# Altium PCB PCB_Palm_v2.2.PcbDoc (part 1 of 3)
Units mil, origin at the board's own origin, x right, y up, seen from the top; angles counter-clockwise.
Board outline 1773 x 1966 mil, 4 copper layers (Top Layer, Signal_1, Signal_2, Bottom Layer), stack 62.008 mil thick; 124 components, 104 nets, 490 pads, 277 vias.
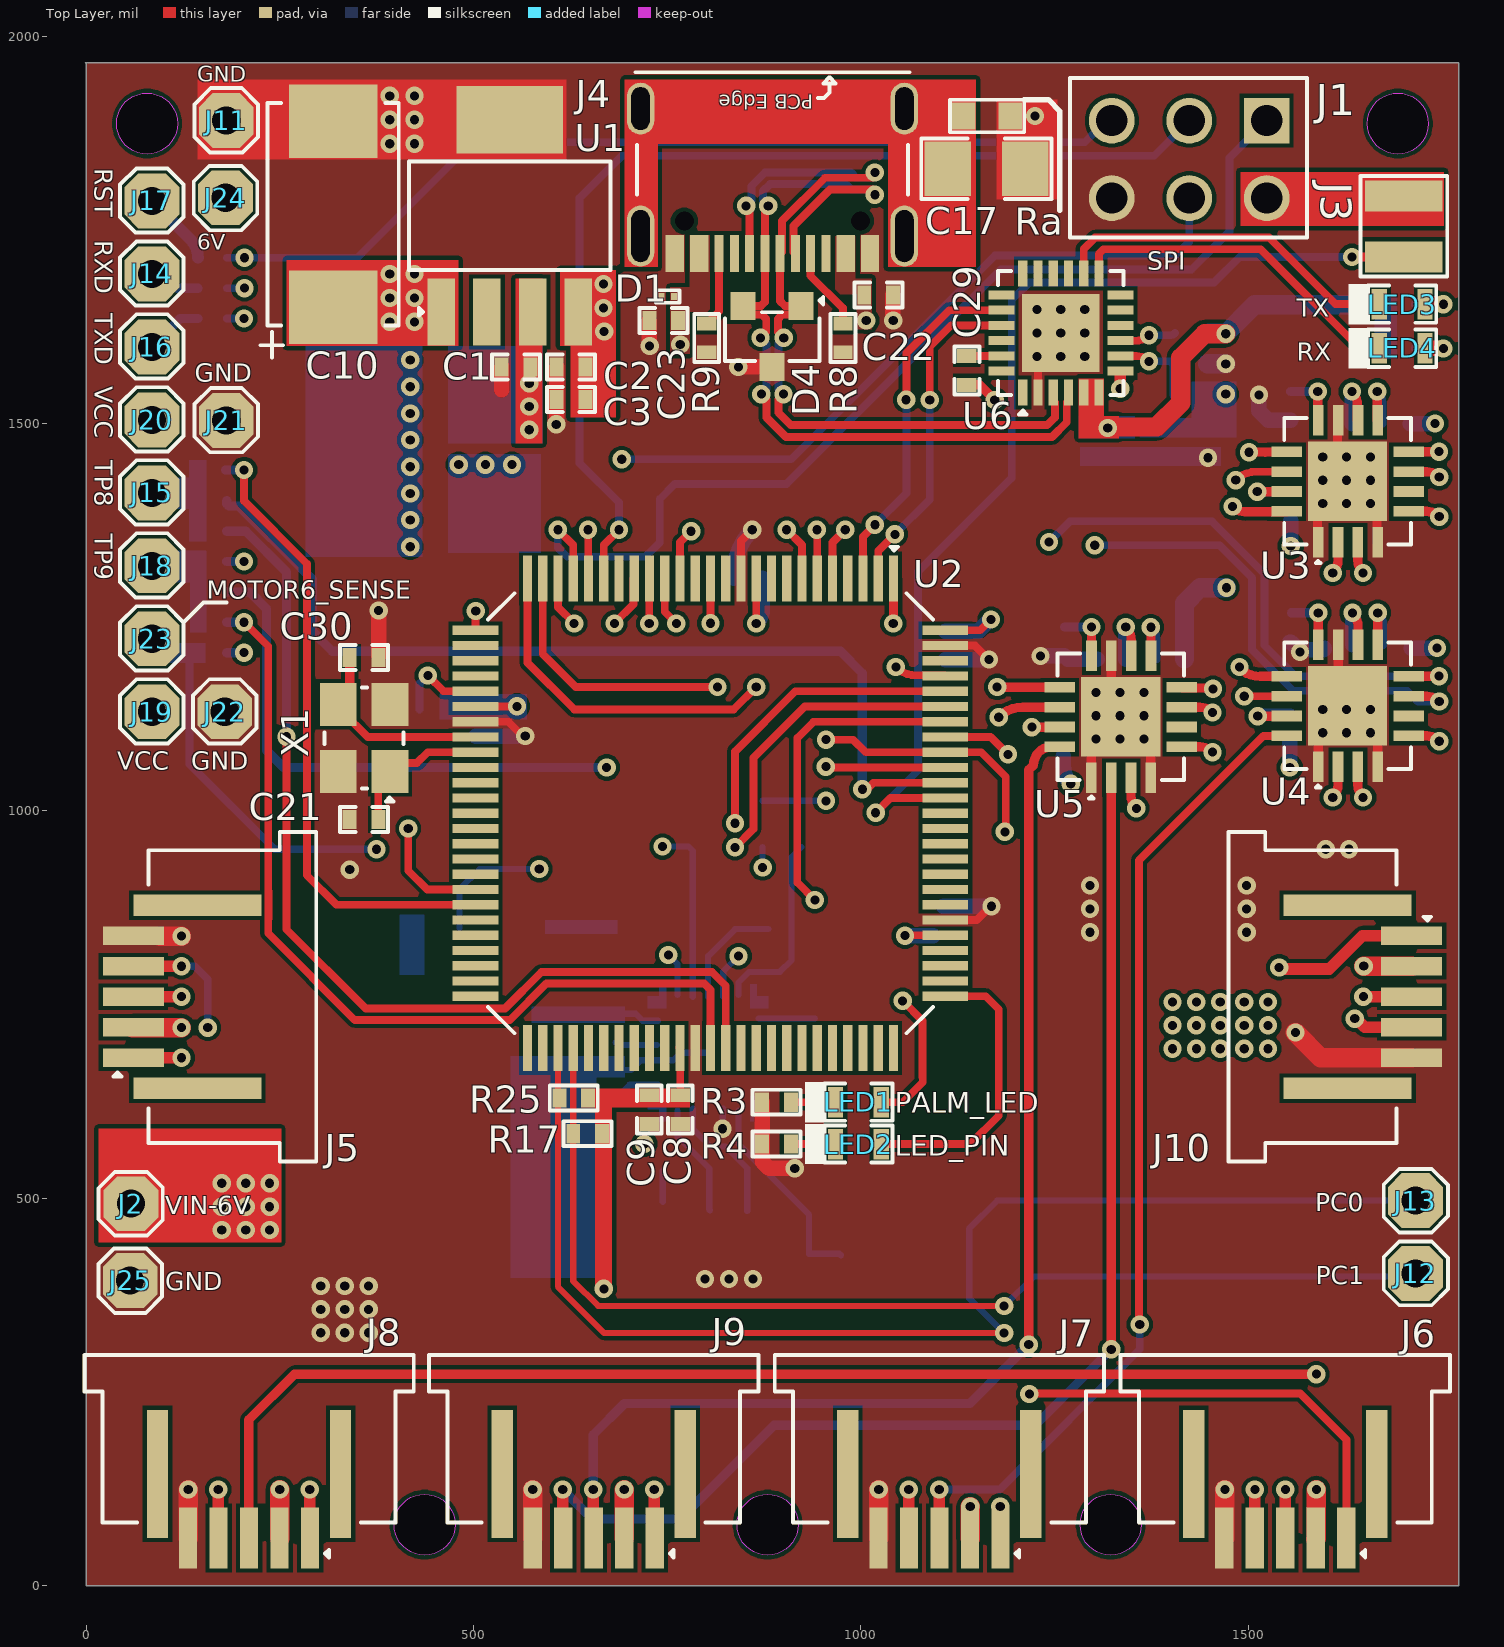
[diagram p0: Top Layer view]
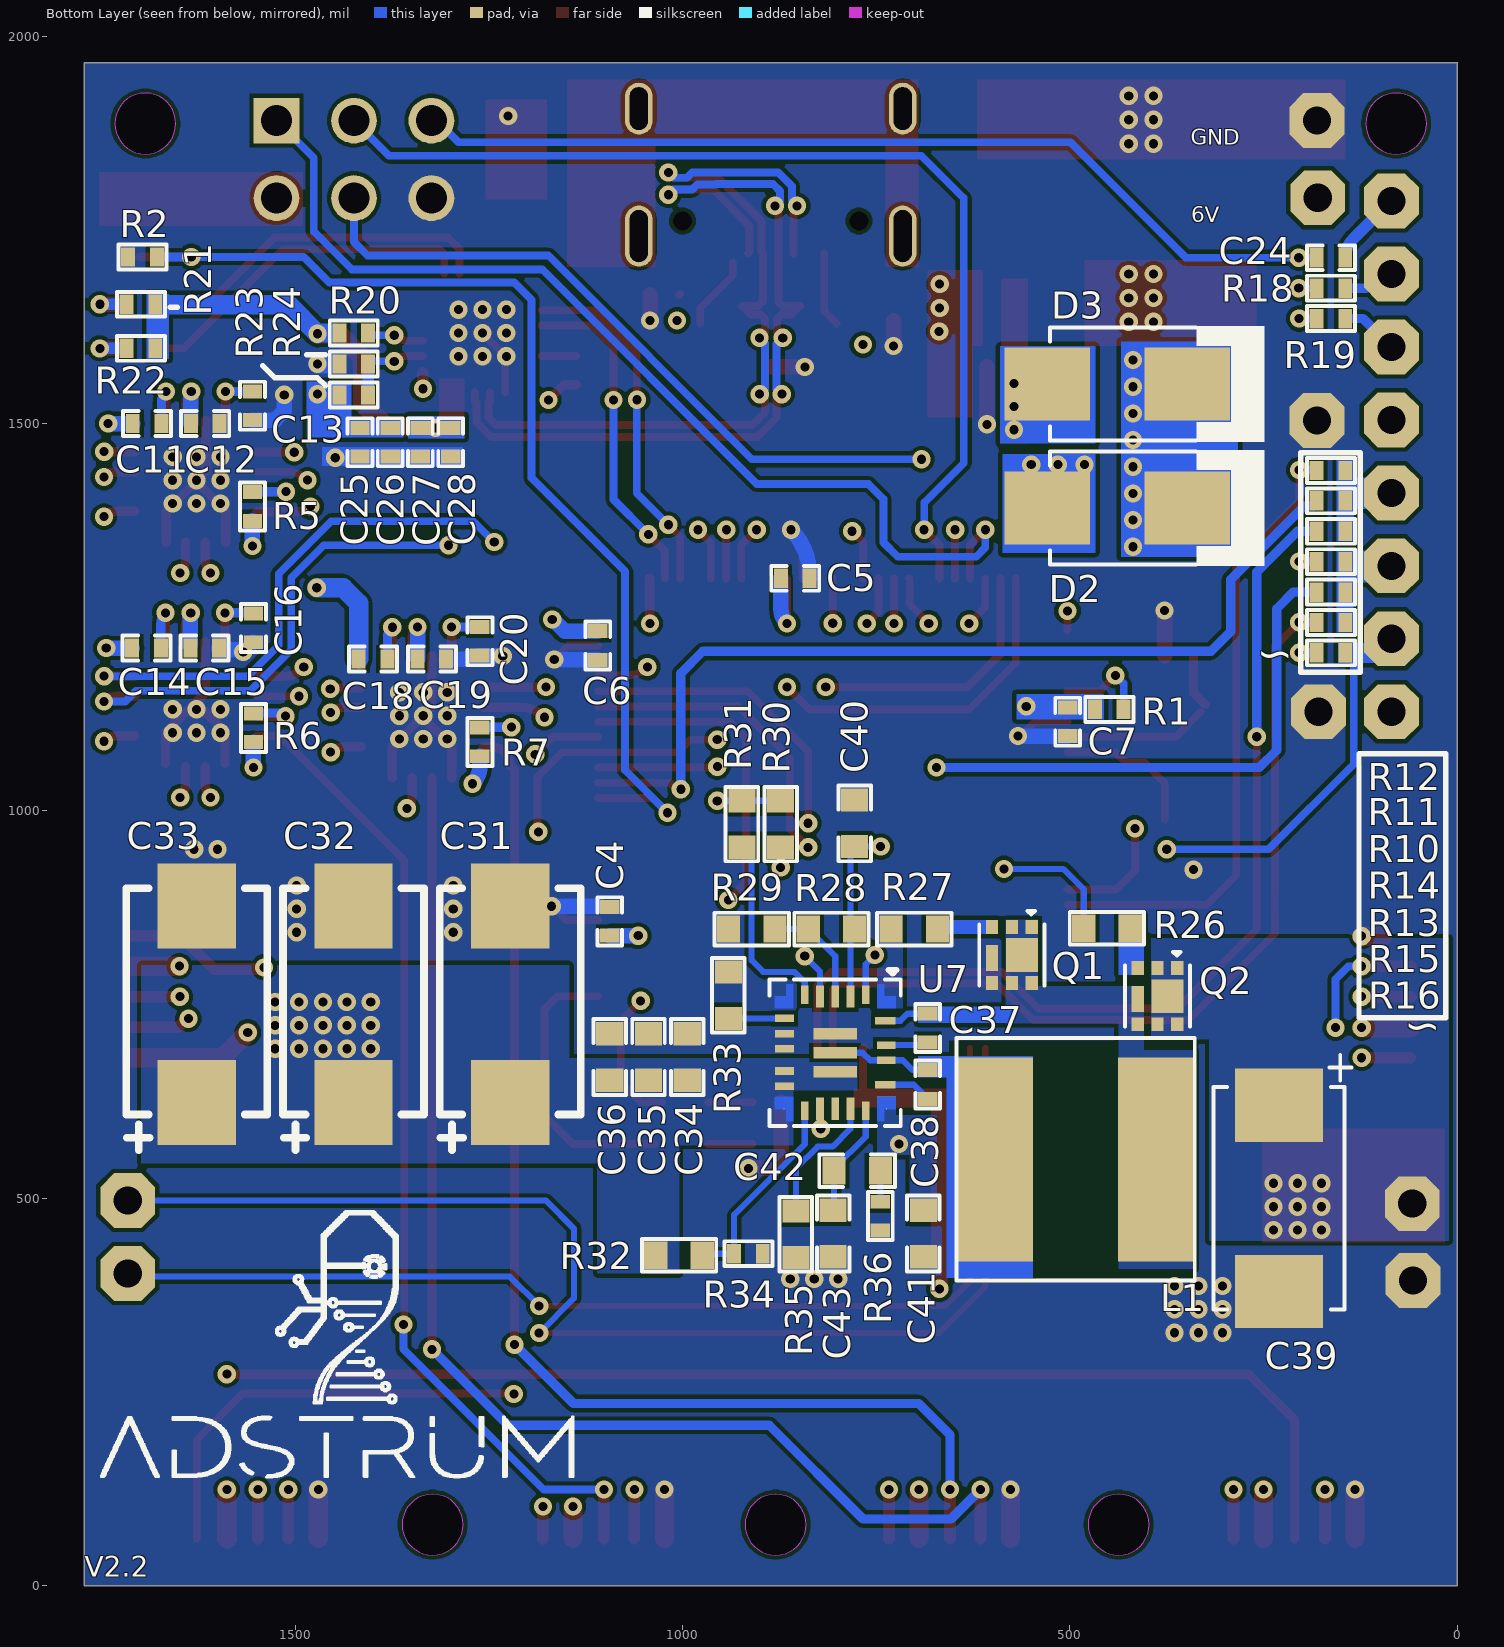
[diagram p1: Bottom Layer view, seen from below]
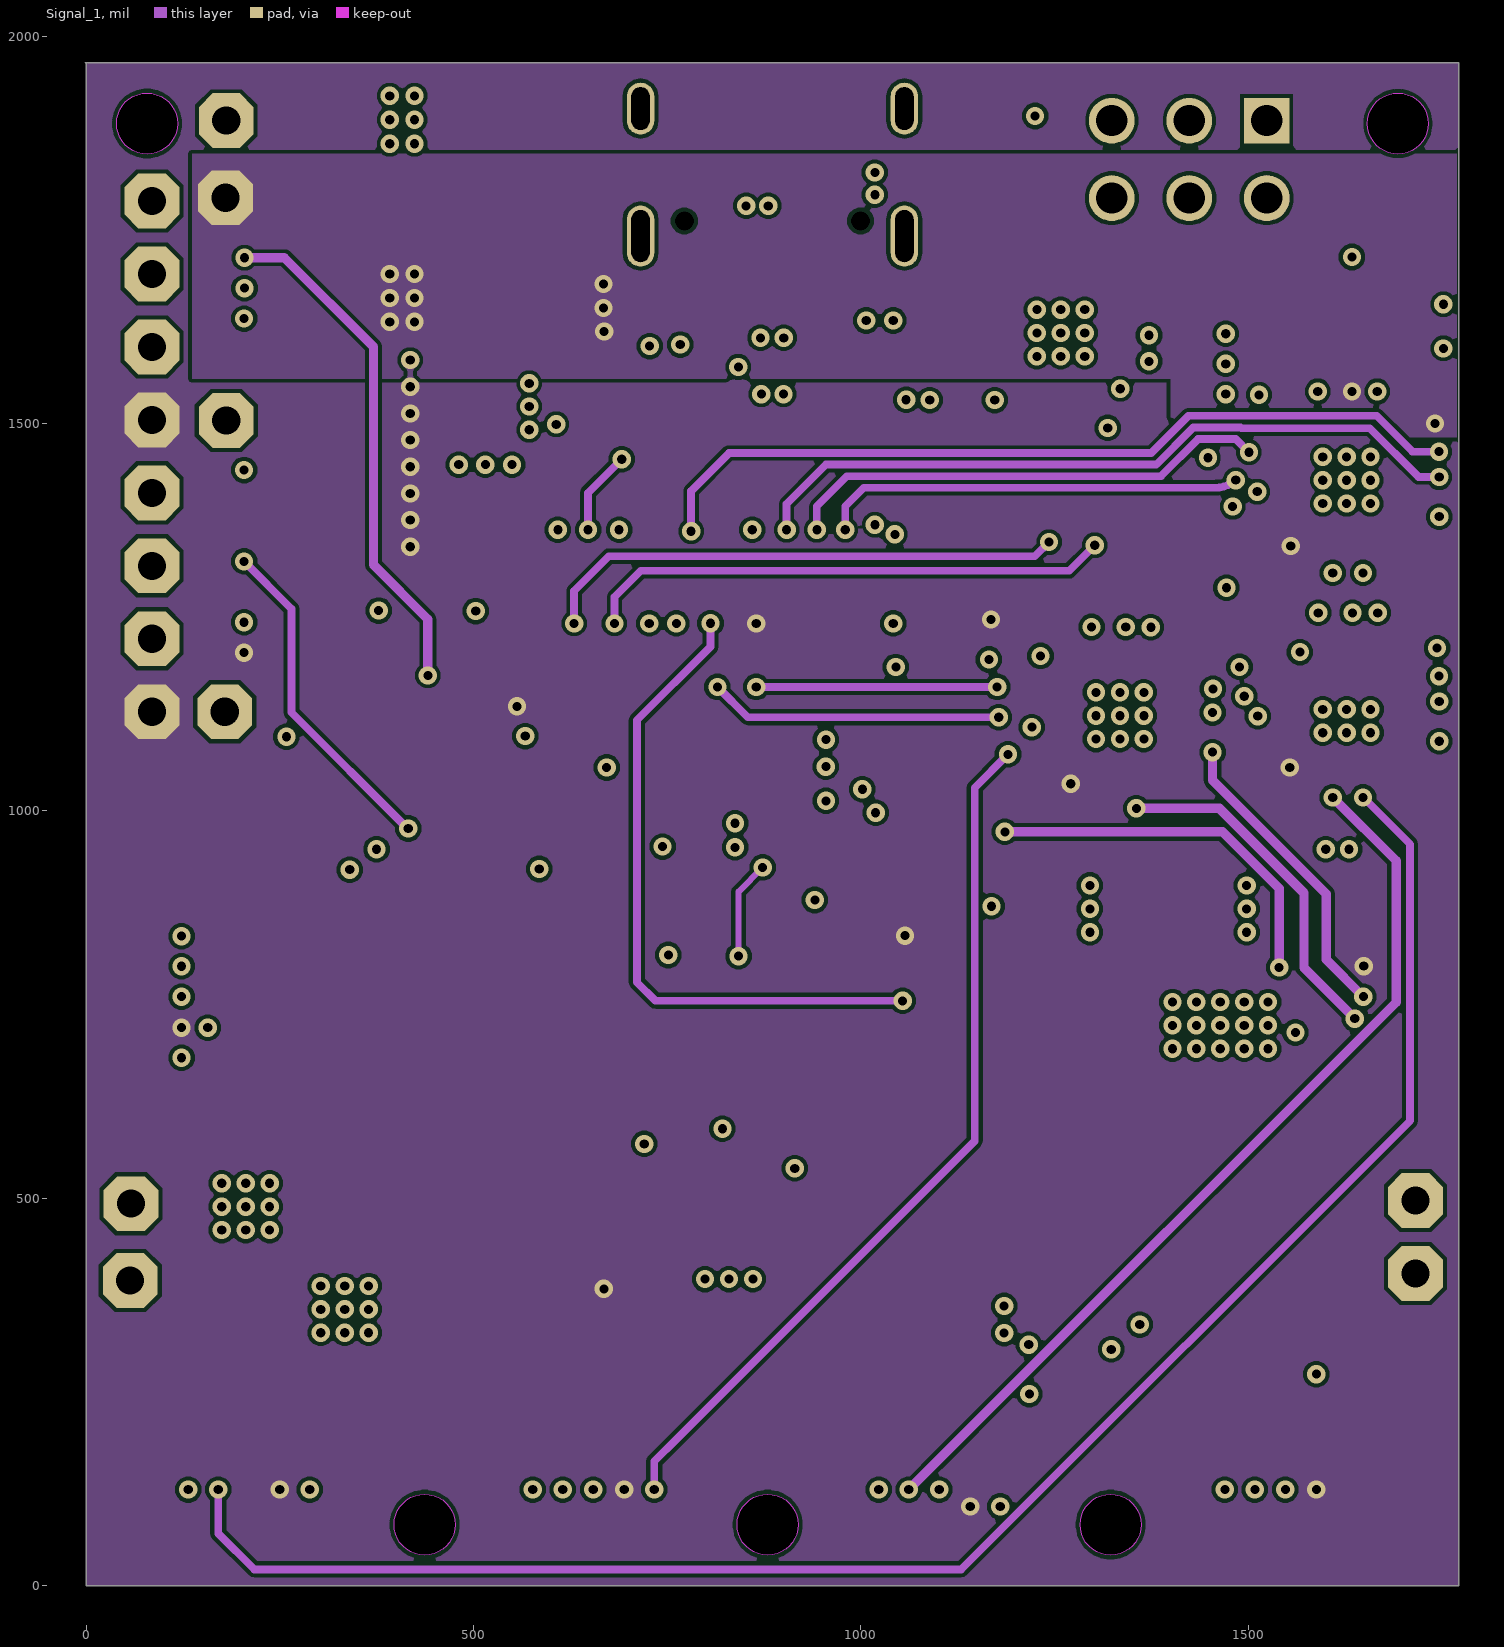
[diagram p2: Signal_1]
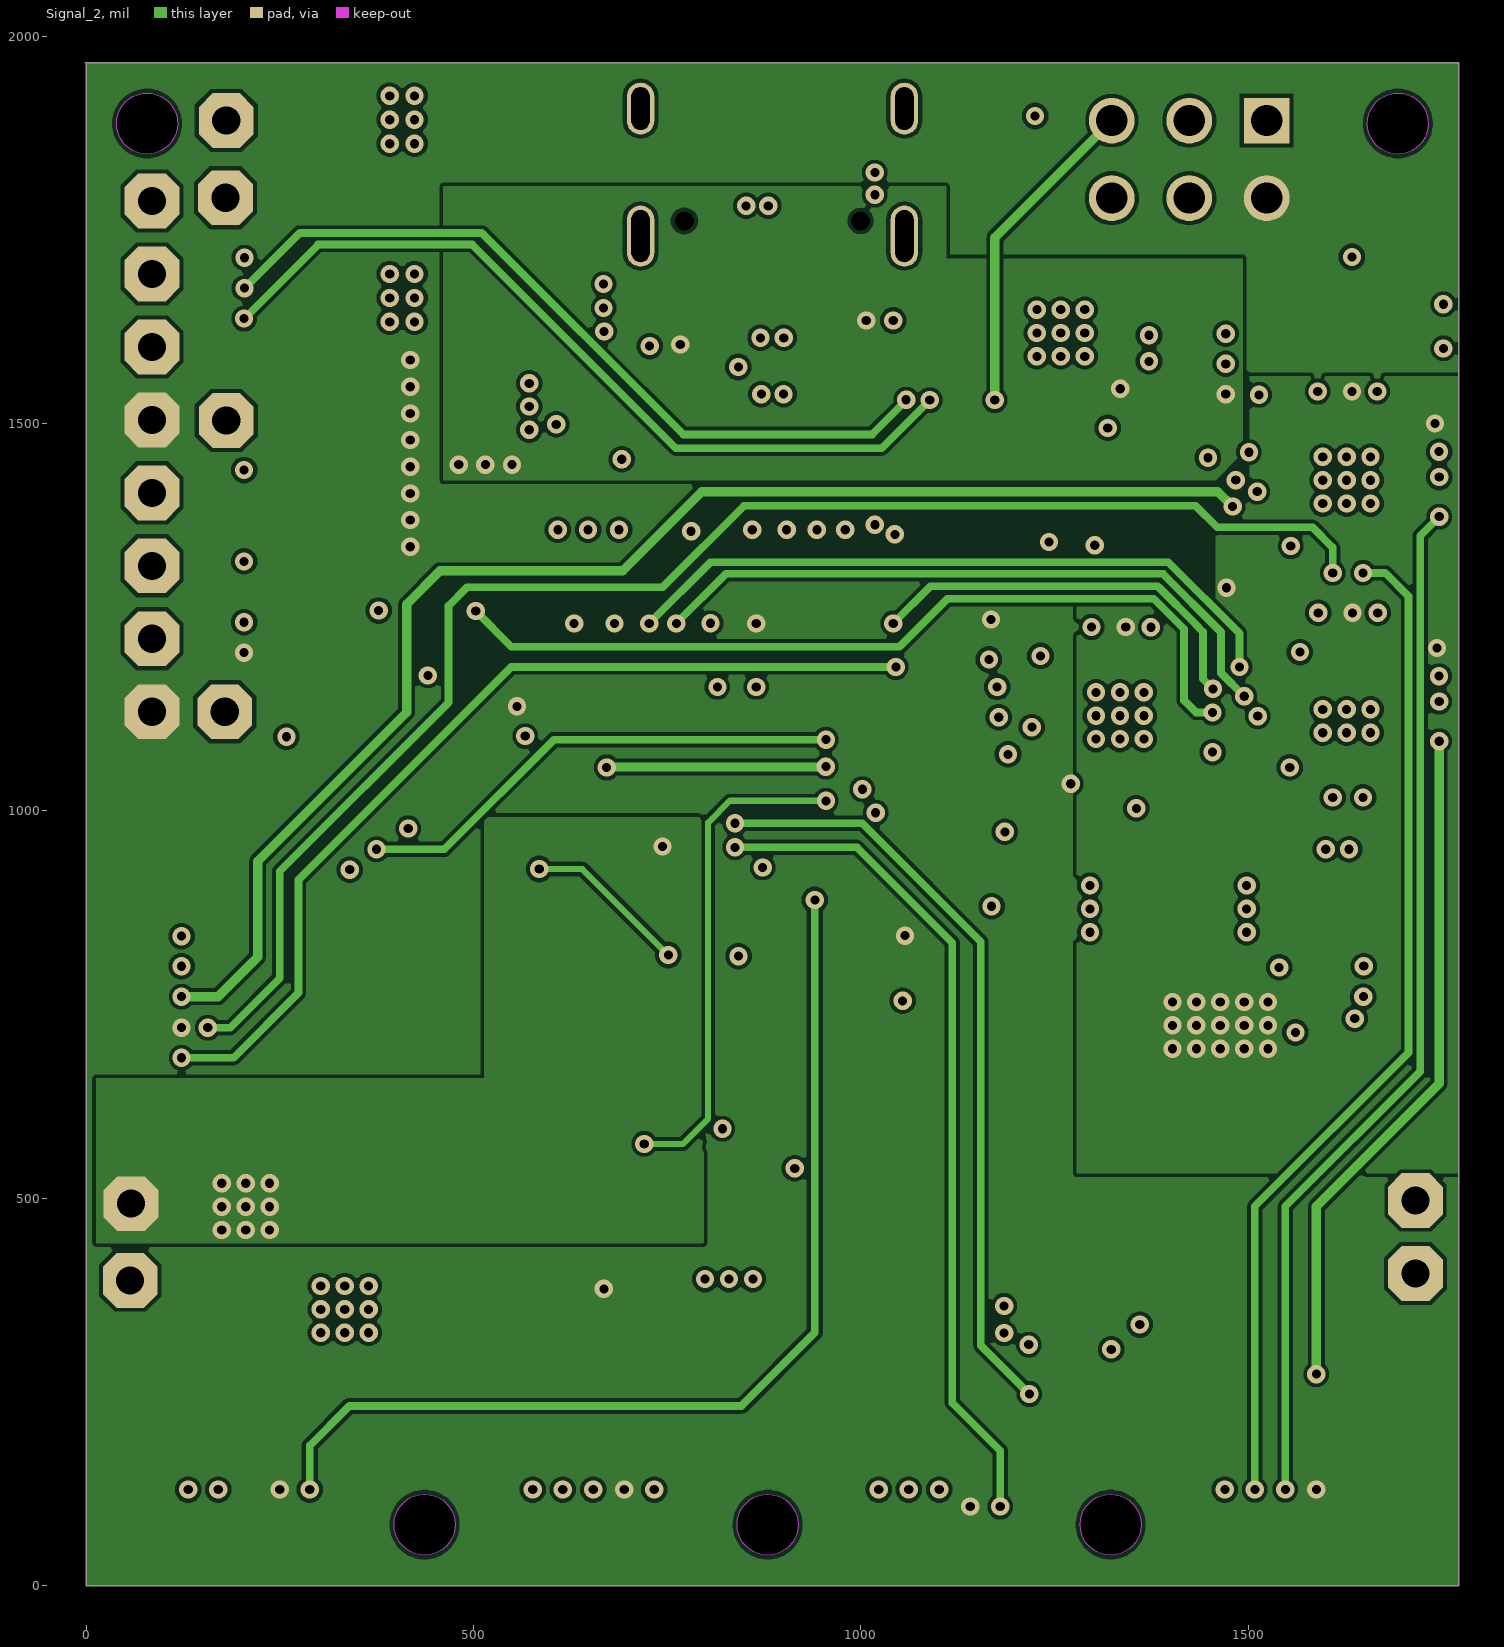
[diagram p3: Signal_2]
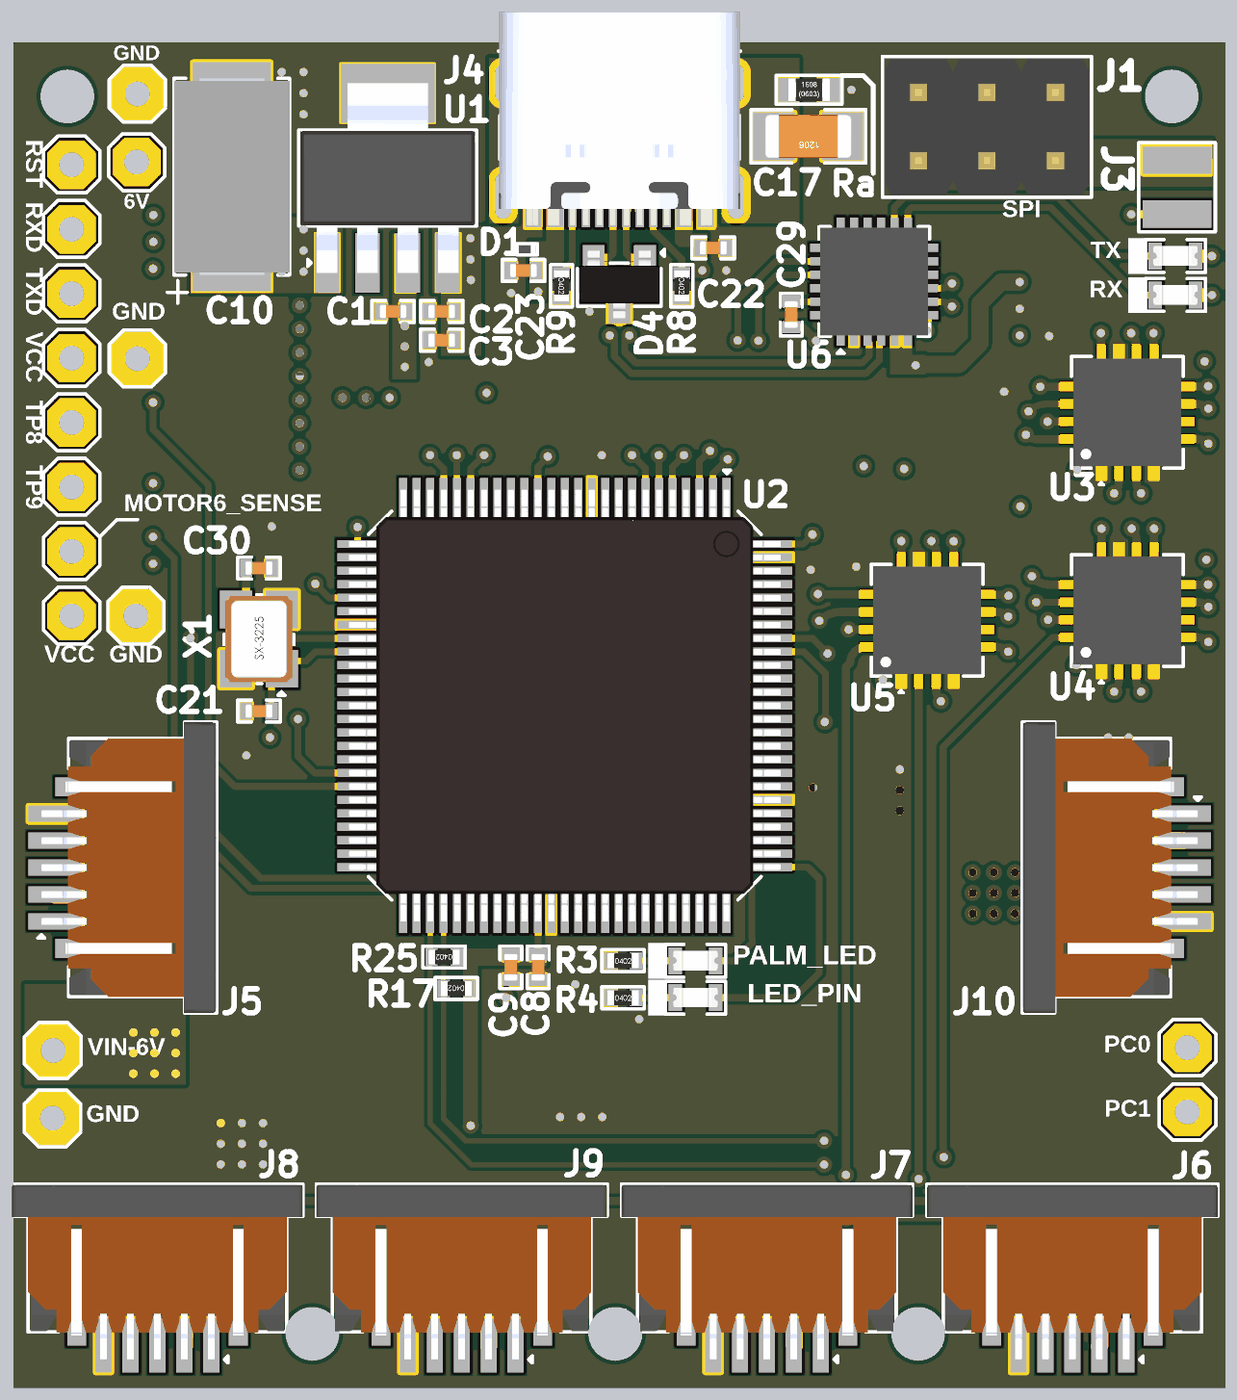
[diagram p5: 3D render of the assembled board from above, using the file's embedded part models]
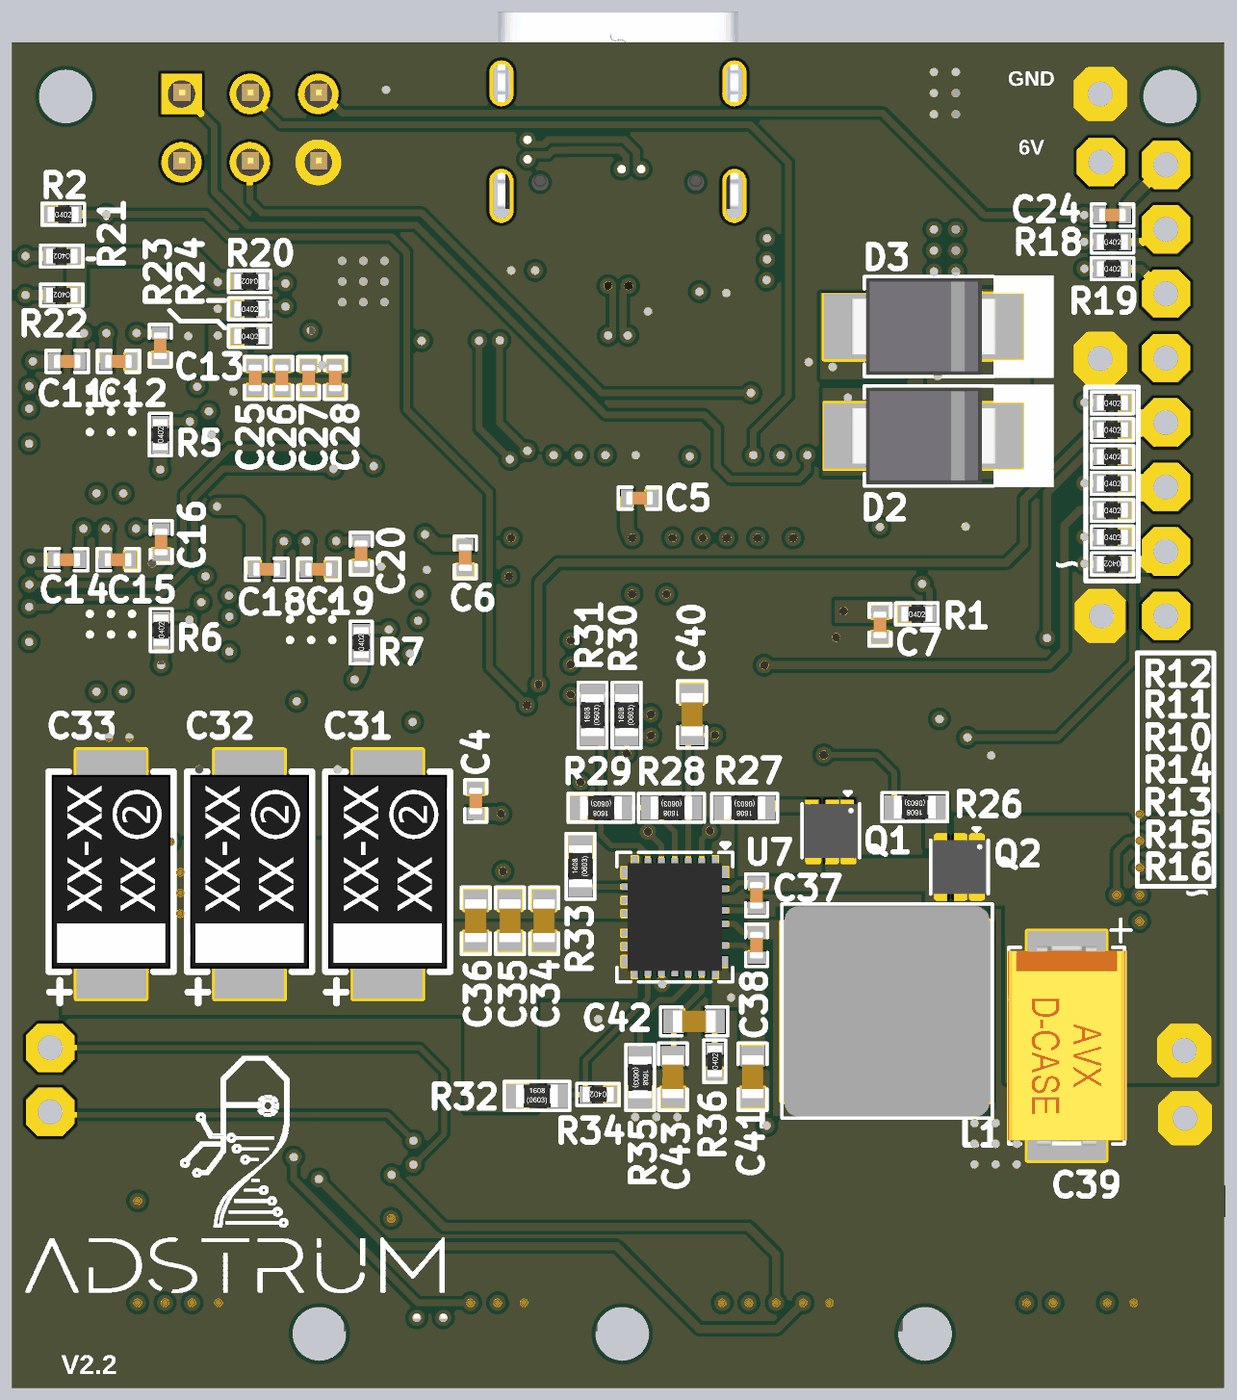
[diagram p6: 3D render of the assembled board from below, using the file's embedded part models]

## Layer stack, top to bottom
Top Solder: solder mask 0.3937, Solder Resist, Dk 3.5
Top Layer: signal copper 1.378
Dielectric 2: prepreg 8.2677, PP-006, Dk 4.1
Signal_1: signal copper 0.3937
Dielectric 1: core 41.929, FR-4, Dk 4.8
Signal_2: signal copper 0.3937
Dielectric 3: prepreg 8.2677, PP-006, Dk 4.1
Bottom Layer: signal copper 1.378
Bottom Solder: solder mask 0.3937, Solder Resist, Dk 3.5

## Board outline
0,0 0,1966 -1,1966 1772,1966 1772,0 1769,0
cut-out: 1322.5,39.38 cw(c1322.5,78.75) 1283.13,78.75 cw(c1322.5,78.75) 1322.5,118.12 cw(c1322.5,78.75) 1361.87,78.75 cw(c1322.5,78.75)
cut-out: 879.75,39.38 cw(c879.75,78.75) 840.38,78.75 cw(c879.75,78.75) 879.75,118.12 cw(c879.75,78.75) 919.12,78.75 cw(c879.75,78.75)
cut-out: 437,39.38 cw(c437,78.75) 397.63,78.75 cw(c437,78.75) 437,118.12 cw(c437,78.75) 476.37,78.75 cw(c437,78.75)
cut-out: 1693.25,1847.88 cw(c1693.25,1887.25) 1653.88,1887.25 cw(c1693.25,1887.25) 1693.25,1926.62 cw(c1693.25,1887.25) 1732.62,1887.25 cw(c1693.25,1887.25)
cut-out: 78.75,1847.88 cw(c78.75,1887.25) 39.38,1887.25 cw(c78.75,1887.25) 78.75,1926.62 cw(c78.75,1887.25) 118.12,1887.25 cw(c78.75,1887.25)

## Design rules (kind name [scope] priority, off if disabled: settings)
Clearance [All] p1: gap=5 ignorepadtopadclearanceinfootprint=FALSE except(4: Arc-SMDPad Track-SMDPad SMDPad-SMDPad)
ComponentClearance [All] p1: gap=5 collisioncheckmode=3 verticalgap=5 showdistances=FALSE
DiffPairsRouting DiffPairsRouting_1 [InDifferentialPairClass('USB_Lines')] p1: maxlimit=5 minlimit=5 mostfreqgap=5 toplayer_minwidth=10.25 toplayer_maxwidth=10.25 toplayer_prefwidth=10.25 midlayer1_minwidth=6.84 midlayer1_maxwidth=6.84 midlayer1_prefwidth=6.84 midlayer2_minwidth=6.84 midlayer2_maxwidth=6.84 midlayer2_prefwidth=6.84 bottomlayer_minwidth=10.25 bottomlayer_maxwidth=10.25 bottomlayer_prefwidth=10.25 impedanceprofiledriven=TRUE impedanceprofileid={57D33A34-CA1C-47BE-A083-47964808DCBB} impedanceprofilevalue=90.000000 maxuncoupledlength=500
DiffPairsRouting [All] p2: maxlimit=10 minlimit=10 mostfreqgap=10 toplayer_minwidth=15 toplayer_maxwidth=15 toplayer_prefwidth=15 midlayer1_minwidth=15 midlayer1_maxwidth=15 midlayer1_prefwidth=15 midlayer2_minwidth=15 midlayer2_maxwidth=15 midlayer2_prefwidth=15 bottomlayer_minwidth=15 bottomlayer_maxwidth=15 bottomlayer_prefwidth=15 maxuncoupledlength=500
HoleSize [All] p1: absolutevalues=TRUE maxlimit=1000 minlimit=1 maxpercent=80.000 minpercent=20.000
HoleToHoleClearance [All] p1: gap=0 allowstackedmicrovias=TRUE
MatchedLengths "Schematic Matched Net Lengths_3" [InNetClass('USB')] p1: tolerance=50 checknetsindiffpair=TRUE checkdiffpairvsdiffpair=FALSE checkxsignals=FALSE checkothers=FALSE
MaxMinImpedance "Schematic Impedance Constraint_3" [InNetClass('USB')] p1: minimum=85.00 maximum=90.00
MinimumSolderMaskSliver [All] p1: minsoldermaskwidth=0
PolygonConnect [All] p1: connectstyle=Direct reliefconductorwidth=10 reliefentries=4 polygonreliefangle="90 Angle" airgapwidth=10
RoutingVias [All] p1: holewidth=11.81 width=23.62 viastyle="Through Hole" minholewidth=11.81 minwidth=23.62 maxholewidth=11.81 maxwidth=23.62
SilkToSilkClearance [All] p1: silktosilkclearance=0
SilkToSolderMaskClearance [IsPad] p1: minsilkscreentomaskgap=0 clearancetoexposedcopper=TRUE
SolderMaskExpansion [All] p1: expansion=4 istentingtop=FALSE
UnRoutedNet [All] p1: checkbadconnections=TRUE
Width [All] p1: maxlimit=100 minlimit=8 preferedwidth=12 minimp=50.000000 maximp=50.000000 favimp=50.000000
22 further rules are at their usual default settings.

## Classes and differential pairs
differential pair class USB_Lines: USB_D
differential pair class HDMI_Lines: USB_D
net class USB: USB_D_N USB_D_P
net class HDMI_TX2: USB_D_N
component class U_USB-to-UART-Sheet: C25 C26 C27 C28 C29 LED3 LED4 R20 R21 R22 R23 R24 SB2 U6
component class U_Power_Sheet: C1 C2 C3 C10 C31 C32 C33 C34 C35 C36 C37 C38 C39 C40 C41 C42 C43 D2 D3 J2 J11 J24 J25 L1 Q1 Q2 R26 R27 R28 R29 R30 R31 R32 R33 R34 R35 R36 U1 U7
component class U_Motor_Sheet: C11 C12 C13 C14 C15 C16 C18 C19 C20 R5 R6 R7 U3 U4 U5
component class U_Motor_Connector_Sheet: J5 J6 J7 J8 J9 J10 J23 R16
component class U_Controller_Sheet: C4 C5 C6 C7 C8 C9 C21 C30 J1 J3 J12 J13 LED1 LED2 R1 R2 R3 R4 R17 R25 U2 X1
component class U_Connector_Sheet: C17 C22 C23 C24 D1 D4 J4 J14 J15 J16 J17 J18 J19 J20 J21 J22 R8 R9 R10 R11 R12 R13 R14 R15 R18 R19 Ra
differential pair USB_D: +USB_D_P -USB_D_N

## Components (designator, comment, footprint, x,y, rotation, side; value= is the part's Value field where it differs from the comment)
C1 "1uF" Cap-0402 555,1573.08 r0 top locked
C2 "10uF" Cap-0402 626,1573.08 r0 top locked
C3 "1uF" Cap-0402 626,1531.08 r0 top locked
C4 "100nF" Cap-0402 1093.83,857.51 r90 bottom
C5 "100nF" Cap-0402 854.37,1300.15 r180 bottom locked
C6 "100nF" Cap-0402 1109.17,1213.52 r270 bottom locked
C7 "100nF" Cap-0402 502.85,1115.11 r270 bottom locked
C8 "100nF" Cap-0402 767,614.5 r270 top
C9 "100nF" Cap-0402 727,614.5 r270 top
C10 "47uF" Case-D 319,1770.08 r90 top locked
C11 "10nF" Cap-0402 1691,1500 r0 bottom locked
C12 "100nF" Cap-0402 1616,1500 r0 bottom locked
C13 "2.2uf" Cap-0402 1555,1523 r90 bottom locked
C14 "10nF" Cap-0402 1691.74,1210.22 r0 bottom locked
C15 "100nF" Cap-0402 1616.74,1210.22 r0 bottom locked
C16 "2.2uf" Cap-0402 1553.74,1236.22 r90 bottom locked
C17 "4.7nF" Cap-1206 1162,1829 r180 top locked
C18 "10nF" Cap-0402 1399.41,1196.06 r0 bottom locked
C19 "100nF" Cap-0402 1323.41,1196.06 r0 bottom locked
C20 "2.2uf" Cap-0402 1261.41,1219.06 r90 bottom locked
C21 "20pF" Cap-0402 358.82,988.96 r0 top
C22 "10nF" Cap-0402 1023,1666 r0 top
C23 "10nF" Cap-0402 745.5,1633 r180 top
C24 "100nF" Cap-0402 163,1714 r0 bottom locked
C25 "100nF" Cap-0402 1416.23,1475.84 r270 bottom locked
C26 "4.7uF" Cap-0402 1377.23,1475.84 r270 bottom locked
C27 "100nF" Cap-0402 1338.23,1475.84 r270 bottom locked
C28 "4.7uF" Cap-0402 1299.23,1475.84 r270 bottom locked
C29 "100nF" Cap-0402 1137,1568.5 r270 top
C30 "20pF" Cap-0402 358.82,1197.94 r180 top
C31 "100uF" Case-E 1222.33,623.51 r90 bottom
C32 "100uF" Case-E 1424.58,623.51 r90 bottom
C33 "100uF" Case-E 1626.83,623.51 r90 bottom
C34 "22uF" Cap-0603 993.83,682.51 r270 bottom
C35 "22uF" Cap-0603 1043.83,682.51 r270 bottom
C36 "22uF" Cap-0603 1093.83,682.51 r270 bottom
C37 "100nF" Cap-0402 683.33,719.74 r90 bottom
C38 "100nF" Cap-0402 683.33,646.9 r270 bottom
C39 "220uF" Case-D 230,499.92 r270 bottom
C40 "22uF" Cap-0603 777.75,984 r270 bottom
C41 "4.7uF" Cap-0603 689.05,454.51 r270 bottom
C42 "4.7nF" Cap-0603 774.48,535.51 r0 bottom
C43 "15pF" Cap-0603 805.55,454.51 r90 bottom
D1 "PESD5V0H1BSFYL" DSN0603-2 750.87,1664 r180 top
D2 "SS54B-HF" SMB_ 438.74,1391.08 r180 bottom locked
D3 "SS54B-HF" SMB_ 438.74,1551 r180 bottom locked
D4 "ESD5302F-3/TR" Sot-23 885.6,1612.63 r180 top
J1 "PH-01291" PH-01291 1424,1841 r180 top locked
J2 "Test Point -TH 1.8mm Hole size 0.92mm" "Test Point -TH 1.8mm Hole size 0.92mm" 58,493 r90 top
J3 "M Solder Pad" "M Solder Pad" 1701,1754.63 r270 top locked
J4 "TYPE-C-31-M-12" TYPE-C-31-M-12_ 886,1813 r180 top locked
J5 "SFW5R-1STE1LF" SFW5R-1STE1LF 102.33,760.24 r90 top locked
J6 "SFW5R-1STE1LF" SFW5R-1STE1LF 1548,103 r180 top locked
J7 "SFW5R-1STE1LF" SFW5R-1STE1LF 1101.5,103 r180 top locked
J8 "SFW5R-1STE1LF" SFW5R-1STE1LF 210.4,103 r180 top locked
J9 "SFW5R-1STE1LF" SFW5R-1STE1LF 655.3,103 r180 top locked
J10 "SFW5R-1STE1LF" SFW5R-1STE1LF 1669.67,760.24 r270 top locked
J11 "Test Point -TH 1.8mm Hole size 0.92mm" "Test Point -TH 1.8mm Hole size 0.92mm" 181,1891 r0 top locked
J12 "Test Point -TH 1.8mm Hole size 0.92mm" "Test Point -TH 1.8mm Hole size 0.92mm" 1716,403 r270 top
J13 "Test Point -TH 1.8mm Hole size 0.92mm" "Test Point -TH 1.8mm Hole size 0.92mm" 1716,497 r270 top
J14 "Test Point -TH 1.8mm Hole size 0.92mm" "Test Point -TH 1.8mm Hole size 0.92mm" 85,1693.22 r0 top locked
J15 "Test Point -TH 1.8mm Hole size 0.92mm" "Test Point -TH 1.8mm Hole size 0.92mm" 85,1410.61 r0 top locked
J16 "Test Point -TH 1.8mm Hole size 0.92mm" "Test Point -TH 1.8mm Hole size 0.92mm" 85,1599.02 r0 top locked
J17 "Test Point -TH 1.8mm Hole size 0.92mm" "Test Point -TH 1.8mm Hole size 0.92mm" 85,1787.43 r0 top locked
J18 "Test Point -TH 1.8mm Hole size 0.92mm" "Test Point -TH 1.8mm Hole size 0.92mm" 85,1316.41 r0 top locked
J19 "Test Point -TH 1.8mm Hole size 0.92mm" "Test Point -TH 1.8mm Hole size 0.92mm" 85,1128 r0 top locked
J20 "Test Point -TH 1.8mm Hole size 0.92mm" "Test Point -TH 1.8mm Hole size 0.92mm" 85,1504.82 r0 top locked
J21 "Test Point -TH 1.8mm Hole size 0.92mm" "Test Point -TH 1.8mm Hole size 0.92mm" 181,1504 r0 top
J22 "Test Point -TH 1.8mm Hole size 0.92mm" "Test Point -TH 1.8mm Hole size 0.92mm" 179,1128 r0 top locked
J23 "Test Point -TH 1.8mm Hole size 0.92mm" "Test Point -TH 1.8mm Hole size 0.92mm" 85,1222.2 r0 top locked
J24 "Test Point -TH 1.8mm Hole size 0.92mm" "Test Point -TH 1.8mm Hole size 0.92mm" 180,1791.43 r180 top
J25 "Test Point -TH 1.8mm Hole size 0.92mm" "Test Point -TH 1.8mm Hole size 0.92mm" 57,394 r180 top
L1 "1.8uH" YSPIT0770A-1R8M 492.67,550 r0 bottom
LED1 "Blue" LED-0603 996.95,624 r180 top
LED2 "Blue" LED-0603 996.95,570 r180 top
LED3 "Yellow" LED-0603 1698.77,1654.16 r180 top locked
LED4 "Yellow" LED-0603 1698.77,1597.16 r180 top locked
Q1 "CSD16301Q2" CSD17313Q2 574.8,814 r270 bottom
Q2 "CSD13202Q2" CSD17313Q2 386.8,761 r270 bottom
R1 "10K" Res-0402 449,1131 r180 bottom
R2 "3.3K" Res-0402 1697,1715 r180 bottom locked
R3 "1K" Res-0402 891.14,624.08 r0 top
R4 "1K" Res-0402 891.14,570 r0 top
R5 "10K" Res-0402 1555,1393 r90 bottom locked
R6 "10K" Res-0402 1553.74,1107.22 r90 bottom locked
R7 "10K" Res-0402 1261.41,1089.06 r90 bottom locked
R8 "5.1K" Res-0402 977,1610.5 r270 top
R9 "5.1K" Res-0402 801,1610.5 r270 top
R10 "DNF" Res-0402 163,1360.93 r180 bottom locked
R11 "10K" Res-0402 163,1400.17 r180 bottom locked
R12 "0R" Res-0402 163,1439.4 r180 bottom locked
R13 "10K" Res-0402 163,1282.47 r180 bottom locked
R14 "0R" Res-0402 163,1321.7 r180 bottom locked
R15 "DNF" Res-0402 163,1243.23 r180 bottom locked
R16 "DNP" Res-0402 163,1204 r0 bottom locked
R17 "10K" Res-0402 647.34,583.5 r180 top
R18 "1K" Res-0402 163,1674.75 r180 bottom locked
R19 "1K" Res-0402 163,1635.5 r180 bottom locked
R20 "1.2K" Res-0402 1424.23,1616.84 r0 bottom locked
R21 "470R" Res-0402 1699,1654 r0 bottom locked
R22 "470R" Res-0402 1699,1597 r0 bottom locked
R23 "22.1K" Res-0402 1424.23,1536.84 r180 bottom locked value=22.1kR
R24 "47.5K" Res-0402 1424.23,1576.84 r180 bottom locked
R25 "10K" Res-0402 629.5,629.5 r180 top
R26 "1R" Res-0603 452,848.51 r180 bottom
R27 "1R" Res-0603 700.83,847.51 r180 bottom
R28 "221K" Res-0603 807.75,847.51 r180 bottom
R29 "100K" Res-0603 910.68,847.51 r180 bottom value=100kR
R30 "102K" Res-0603 873.3,983 r270 bottom value=102kR
R31 "102K" Res-0603 923.18,983 r270 bottom value=102kR
R32 "100K" Res-0603 1004.33,426.51 r0 bottom value=100kR
R33 "49K9" Res-0603 940.68,762.2 r270 bottom
R34 "24.9K" Res-0402 914.83,428.51 r0 bottom
R35 "27K" Res-0603 853.55,453.51 r90 bottom
R36 "43k" Res-0402 744.48,477.01 r90 bottom
Ra "1M" Res-0603 1163,1897 r180 top locked
U1 "LP38692MP-5.0/NOPB" SOT-223-5 547,1768.08 r0 top locked
U2 "ATMEGA2560-16AU" TQFP-100(14x14) 806,997 r270 top locked
U3 "DRV8833RTYR" QFN-16-EP(4x4) 1628.32,1425.62 r90 top locked
U4 "DRV8833RTYR" QFN-16-EP(4x4) 1628.32,1135.84 r90 top locked
U5 "DRV8833RTYR" QFN-16-EP(4x4) 1335.67,1121.68 r90 top locked
U6 "CP2102N-A02-GQFN24R" "24-QFN (4x4)" 1258.23,1616.84 r90 top locked
U7 "TPS552882QRPMRQ1" "26-VQFN-HR (4X3.5)" 802.83,687.91 r270 bottom
X1 "X322516MLB4SI" SMD3225-4P 358.82,1094.18 r90 top

## Footprints (in the part's own frame and the unit in brackets; to place one, negate y for a bottom-side part, rotate by r counter-clockwise, add the part's x,y. Pads: shape width x height; smd on the part's side, far side on the other; paste and mask are expansions set on the pad)
"24-QFN (4x4)" [mm]
  rect 0.85x0.3 smd: 1(-1.95,1.25) 2(-1.95,0.75) 3(-1.95,0.25) 4(-1.95,-0.25) 5(-1.95,-0.75) 6(-1.95,-1.25) 13(1.95,-1.25) 14(1.95,-0.75) 15(1.95,-0.25) 16(1.95,0.25) 17(1.95,0.75) 18(1.95,1.25)
  rect 0.3x0.85 smd: 7(-1.25,-1.95) 8(-0.75,-1.95) 9(-0.25,-1.95) 10(0.25,-1.95) 11(0.75,-1.95) 12(1.25,-1.95) 19(1.25,1.95) 20(0.75,1.95) 21(0.25,1.95) 22(-0.25,1.95) 23(-0.75,1.95) 24(-1.25,1.95)
  rect 2.55x2.55 smd: 25(0,0)
  silkscreen extent -2.67,-2.06 2.03,2.06, body extent -2,-2 2,2, height 0.8
"26-VQFN-HR (4X3.5)" [mm]
  round 0.025 smd mask+0.05: 1(-1.85,1.677) 7(-1.85,-1.678) 13(1.85,-1.677) 19(1.85,1.677)
  rect 0.6x0.25 smd paste+0 mask+0.05: 2(-1.9,1) 6(-1.9,-1) 14(1.9,-1) 18(1.9,1)
  rect 0.725x0.25 smd paste+0 mask+0.05: 3(-1.838,0.5) 4(-1.838,0) 5(-1.838,-0.5) 15(1.838,-0.5) 16(1.838,0) 17(1.838,0.5)
  rect 0.25x0.625 smd paste+0 mask+0.05: 8(-1.125,-1.665) 9(-0.625,-1.665) 10(-0.125,-1.665) 11(0.6,-1.665) 12(1.1,-1.665)
  rect 0.25x0.675 smd paste+0 mask+0.05: 20(1.05,1.64) 23(-1.05,1.64)
  rect 0.25x0.6 smd paste+0 mask+0.05: 21(0.25,1.678) 22(-0.25,1.678)
  rect 0.375x1.435 smd paste+0 mask+0.05: 24(-0.625,0) 25(0,0) 26(0.625,0)
  Top Layer region: -1.45,1.377 -2.25,1.377 -2.25,1.602 -1.85,1.602 -1.85,1.977 -1.45,1.977 -1.45,1.377
  Top Layer region: -1.45,-1.378 -1.45,-1.978 -1.85,-1.978 -1.85,-1.603 -2.25,-1.603 -2.25,-1.378 -1.45,-1.378
  Top Layer region: 1.45,-1.377 2.25,-1.377 2.25,-1.602 1.85,-1.602 1.85,-1.977 1.45,-1.977 1.45,-1.377
  Top Layer region: 1.45,1.377 1.45,1.977 1.85,1.977 1.85,1.602 2.25,1.602 2.25,1.377 1.45,1.377
  silkscreen extent -2.72,-2.15 2.4,2.15, body extent -2,-1.75 2,1.75, height 1
Cap-0402 [mil]
  rect 18x25 smd mask+2.36: 1(-18.5,0) 2(18.5,0)
  silkscreen extent -31,-16 31,16, body extent -20,-10 20,10, height 19
Cap-0603 [mil]
  rect 30x35 smd mask+2.36: 1(-30,0) 2(30,0)
  silkscreen extent -49,-21 49,21, body extent -32,-16 31,16, height 34
Cap-1206 [mil] "SMD 1206"
  rect 60x70 smd: 1(-50,0) 2(50,0)
  silkscreen extent -84,-39 84,39, body extent -63,-31 63,32, height 39
Case-D [mm]
  rect 2.4x2.9 smd: 1(-3.05,0) 2(3.05,0)
  silkscreen extent -4.7,-2.15 3.65,2.39, body extent -3.65,-2.16 3.65,2.14, height 4
Case-E [mm]
  rect 2.79x2.57 smd: 1(0,0) 2(6.44,0)
  silkscreen extent -1.56,-2.31 7.03,2.31, body extent -0.27,-2.21 6.92,2.21, height 2.88
CSD17313Q2 [mm] "6-WSON (2x2)"
  rect 0.455x0.4 smd paste-1: 1(-0.923,0.65) 2(-0.923,0) 3(-0.923,-0.65) 4(0.923,-0.65) 5(0.923,0) 6(0.923,0.65)
  rect 0.85x0.4 smd paste-0.05: 7(0.096,-0.65)
  rect 1.1x1.05 smd paste-0.05: 8(0,0.325)
  silkscreen extent -1.45,-1.07 1,1.07, body extent -1,-1 1,1, height 0.8
DSN0603-2 [mm]
  rect 0.2x0.24 smd mask+0.055: 1(-0.2,0) 2(0.2,0)
  silkscreen extent -0.38,-0.2 0.38,0.2, body extent -0.3,-0.15 0.3,0.15, height 0.32
LED-0603 [mm]
  rect 0.5x1 smd: 1(-0.75,0) 2(0.75,0)
  silkscreen extent -1.12,-0.66 1.75,0.66, body extent -0.82,-0.37 0.82,0.36, height 0.68
"M Solder Pad" [mil]
  rect 40x100 smd: 1(-39.37,0) 2(39.37,0)
  silkscreen extent -65,-56 65,56
PH-01291 [mm]
  rect 1.5x1.5 hole 1.02: 1(-2.54,-1.27)
  round 1.5 hole 1.02: 2(-2.54,1.27) 3(0,-1.27) 4(0,1.27) 5(2.54,-1.27) 6(2.54,1.27)
  silkscreen extent -3.86,-2.66 3.91,2.56, body extent -3.79,-2.59 3.83,2.49, height 8.27
QFN-16-EP(4x4) [mm]
  rect 1x0.35 smd paste-100 mask+0.051: 1(-2,0.965) 2(-2,0.315) 3(-2,-0.335) 4(-2,-0.986) 9(2,-0.991) 10(2,-0.34) 11(2,0.31) 12(2,0.96)
  rect 0.35x1 smd paste-100 mask+0.051: 5(-0.991,-2) 6(-0.34,-2) 7(0.31,-2) 8(0.96,-2) 13(0.96,2) 14(0.31,2) 15(-0.34,2) 16(-0.991,2)
  rect 2.6x2.6 smd paste-100 mask+0.051: 17(0,0)
  silkscreen extent -2.69,-2.07 2.07,2.07, body extent -2,-2 2,2, height 0.8
Res-0402 [mil]
  rect 18x25 smd mask+2.17: 1(-18.5,0) 2(18.5,0)
  silkscreen extent -32,-17 32,16, body extent -23,-11 23,11, height 16
Res-0603 [mil]
  rect 30x35 smd: 1(-30,0) 2(30,0)
  silkscreen extent -48,-21 48,21, body extent -31,-17 31,17, height 18
SFW5R-1STE1LF [mm]
  rect 0.6x2 smd: 1(-2,1.05) 2(-1,1.05) 3(0,1.05) 4(1,1.05) 5(2,1.05)
  rect 0.7x4.2 smd: MP1(-3,-1.05) MP2(3,-1.05)
  silkscreen extent -5.4,-4.95 5.4,1.69, body extent -5.4,-4.93 5.4,1.57, height 2.7
SMB_ [mm]
  rect 2.8x2.4 smd: 1(-2.3,0) 2(2.3,0)
  silkscreen extent -2.21,-1.91 4.83,1.9, body extent -2.7,-1.8 2.7,1.8, height 2.3
SMD3225-4P [mm]
  rect 1.4x1.2 smd: 1(-1.1,-0.85) 2(1.1,-0.85) 3(1.1,0.85) 4(-1.1,0.85)
  silkscreen extent -2.08,-1.3 1.65,1.3, body extent -1.6,-1.25 1.6,1.25, height 0.81
Sot-23 [mm] "TRANS NPN 40V 0.6A SOT23"
  rect 0.82x0.92 smd: 1(-0.95,-1) 2(0.95,-1) 3(0,1)
  silkscreen extent -1.68,-1.3 1.55,0.81, body extent -1.5,-1.25 1.5,1.25, height 1.05
SOT-223-5 [mm]
  rect 0.9x2.2 smd paste+0 mask+0.051: 1(-2.25,-3.15) 2(-0.75,-3.15) 3(0.75,-3.15) 4(2.25,-3.15)
  rect 3.5x2.2 smd paste+0 mask+0.051: 5(0,3.15)
  silkscreen extent -3.3,-3.28 3.3,1.78, body extent -3.25,-3.52 3.25,3.52, height 1.8
"Test Point -TH 1.8mm Hole size 0.92mm" [mm]
  oct 1.8x1.8 hole 0.92: 1(0,0)
  silkscreen extent -1.04,-1.04 1.04,1.07
TQFP-100(14x14) [mm]
  rect 1.5x0.3 smd: 1(-7.7,6) 2(-7.7,5.5) 3(-7.7,5) 4(-7.7,4.5) 5(-7.7,4) 6(-7.7,3.5) 7(-7.7,3) 8(-7.7,2.5) 9(-7.7,2) 10(-7.7,1.5) 11(-7.7,1) 12(-7.7,0.5) 13(-7.7,0) 14(-7.7,-0.5) 15(-7.7,-1) 16(-7.7,-1.5) 17(-7.7,-2) 18(-7.7,-2.5) 19(-7.7,-3) 20(-7.7,-3.5) 21(-7.7,-4) 22(-7.7,-4.5) 23(-7.7,-5) 24(-7.7,-5.5) 25(-7.7,-6) 51(7.7,-6) 52(7.7,-5.5) 53(7.7,-5) 54(7.7,-4.5) 55(7.7,-4) 56(7.7,-3.5) 57(7.7,-3) 58(7.7,-2.5) 59(7.7,-2) 60(7.7,-1.5) 61(7.7,-1) 62(7.7,-0.5) 63(7.7,0) 64(7.7,0.5) 65(7.7,1) 66(7.7,1.5) 67(7.7,2) 68(7.7,2.5) 69(7.7,3) 70(7.7,3.5) 71(7.7,4) 72(7.7,4.5) 73(7.7,5) 74(7.7,5.5) 75(7.7,6)
  rect 0.3x1.5 smd: 26(-6,-7.7) 27(-5.5,-7.7) 28(-5,-7.7) 29(-4.5,-7.7) 30(-4,-7.7) 31(-3.5,-7.7) 32(-3,-7.7) 33(-2.5,-7.7) 34(-2,-7.7) 35(-1.5,-7.7) 36(-1,-7.7) 37(-0.5,-7.7) 38(0,-7.7) 39(0.5,-7.7) 40(1,-7.7) 41(1.5,-7.7) 42(2,-7.7) 43(2.5,-7.7) 44(3,-7.7) 45(3.5,-7.7) 46(4,-7.7) 47(4.5,-7.7) 48(5,-7.7) 49(5.5,-7.7) 50(6,-7.7) 76(6,7.7) 77(5.5,7.7) 78(5,7.7) 79(4.5,7.7) 80(4,7.7) 81(3.5,7.7) 82(3,7.7) 83(2.5,7.7) 84(2,7.7) 85(1.5,7.7) 86(1,7.7) 87(0.5,7.7) 88(0,7.7) 89(-0.5,7.7) 90(-1,7.7) 91(-1.5,7.7) 92(-2,7.7) 93(-2.5,7.7) 94(-3,7.7) 95(-3.5,7.7) 96(-4,7.7) 97(-4.5,7.7) 98(-5,7.7) 99(-5.5,7.7) 100(-6,7.7)
  silkscreen extent -8.74,-7.29 7.21,7.29, body extent -8.01,-8.01 8.01,8.01, height 1.1
TYPE-C-31-M-12_ [mm]
  rect 0.6x1.2 smd: A1/B12(-3.2,2.375) A4/B9(-2.4,2.375) B1/A12(3.2,2.375) B4/A9(2.4,2.375)
  rect 0.3x1.2 smd: A5(-1.25,2.375) A6(-0.25,2.375) A7(0.25,2.375) A8(1.25,2.375) B5(1.75,2.375) B6(0.75,2.375) B7(-0.75,2.375) B8(-1.75,2.375)
  round 0 hole 0.62 unplated: MH(-2.89,1.305) MH(2.89,1.305)
  oval 0.9x2 hole 0.6 slot 1.7 at 90 deg: S1(4.325,1.805) S4(-4.325,1.805)
  oval 0.9x1.7 hole 0.6 slot 1.4 at 90 deg: S2(4.325,-2.375) S3(-4.325,-2.375)
  silkscreen extent -4.5,-3.57 4.5,0.44, body extent -4.47,-5.01 4.47,2.89, height 3.31
YSPIT0770A-1R8M [mm]
  rect 2.5x6.7 smd: 1(-2.65,0) 2(2.65,0)
  silkscreen extent -3.91,-3.99 3.9,3.96, body extent -3.8,-3.9 3.8,3.9, height 6.7

## Part data
C1 C3: library part CC0402KRX5R6BB105, "CAP CER 1UF 10V X5R 0402", Case Code (Imperial)=0402, Case Code (Metric)=1005, Dielectric=X5R, LCSC Part Number=C106254, MAnufacturer=Yageo, Max Operating Temperature=85°C, Min Operating Temperature=-55°C, Package Quantity=1, Resistor Type=Ceramic, Supplier Part Number 1=603-CC402KRX5R6BB105, Tolerance=10%, Voltage Rating=10V, Capacitance=1uF, Case/Package=0402, Category="Ceramic Capacitors", ComponentLink1Description=https://datasheet.ciiva.com/176/upy-gphc-x5r-4v-to-50v-12-176704.pdf?src-supplier=Digi-Key, ComponentLink1URL=https://datasheet.ciiva.com/176/upy-gphc-x5r-4v-to-50v-12-176704.pdf?src-supplier=Digi-Key, ComponentLink2Description=https://datasheet.ciiva.com/176/mlccorderingcode-176705.pdf?src-supplier=Digi-Key, ComponentLink2URL=https://datasheet.ciiva.com/176/mlccorderingcode-176705.pdf?src-supplier=Digi-Key, ComponentLink3Description=https://datasheet.ciiva.com/176/mlccorderingcode-176706.pdf?src-supplier=Digi-Key, ComponentLink3URL=https://datasheet.ciiva.com/176/mlccorderingcode-176706.pdf?src-supplier=Digi-Key, Construction=Flat, Depth=0.5mm, Dissipation Factor=15%, Halogen Free="Halogen Free", Height=0.5mm, Item Type=Capacitor, Lead Free="Lead Free", Length=1mm, Manufacturer Part Number=CC0402KRX5R6BB105, Mount="Surface Mount", Number of Pins=2, Packaging="Tape and Reel", Pricing 1="1=0.11000, 10=0.05500, 50=0.05500, 100=0.03300, 500=0.02700, 1000=0.02200, 2500=0.02100, 10000=0.01800 (USD)", Radiation Hardening=No, REACH SVHC="No SVHC", RoHS=Yes, RoHS Compliant=Yes, Series=CC, Stock 1=6711367, Supplier 1=Mouser, Termination=SMD/SMT, Thickness=0.022inch, Voltage Rating (DC)=10V, Width=0.02inch
C2: library part CC0402MRX5R6BB106, "CAP CER 10UF 10V X5R 0402", Case Code (Imperial)=0402, Case Code (Metric)=1005, LCSC Part Number=C962143, MAnufacturer=Yageo, Max Operating Temperature=85°C, Min Operating Temperature=-55°C, Supplier Part Number 1=6097631, Tolerance=20%, Voltage Rating=10V, Capacitance=10uF, Case/Package=0402, Category="Ceramic Capacitors", ComponentLink1Description=http://www.yageo.com/documents/recent/UPY-GPHC_X5R_4V-to-50V_25.pdf?src-supplier=Digi-Key, ComponentLink1URL=http://www.yageo.com/documents/recent/UPY-GPHC_X5R_4V-to-50V_25.pdf?src-supplier=Digi-Key, Item Type=Capacitor, Manufacturer Part Number=CC0402MRX5R6BB106, Mount="Surface Mount", Packaging="Tape and Reel", Pricing 1="10000=0.02650, 20000=0.02590, 30000=0.02550, 40000=0.02530, 50000=0.02450 (USD)", RoHS=Yes, RoHS Compliant=Yes, Stock 1=80000, Supplier 1="Future Electronics"
C4 C5 C6 C7 C8 C9 C12 C15 C19 C24 C25 C27 C29 C37 C38: library part CC0402KRX5R8BB104, "CAP CER 0.1UF 25V X5R 0402", Case Code (Imperial)=0402, Case Code (Metric)=1005, Dielectric=X5R, LCSC Part Number=C106256, MAnufacturer=Yageo, Max Operating Temperature=85°C, Min Operating Temperature=-55°C, Resistor Type=Ceramic, Supplier Part Number 1=311-1697-1-ND, Tolerance=10%, Voltage Rating=25V, Capacitance=100nF, Case/Package=0402, Category="Ceramic Capacitors", ComponentLink1Description=http://www.mouser.com/ds/2/447/UPY-GPHC_X5R_4V-to-50V_25-1131599.pdf?src-supplier=Mouser, ComponentLink1URL=http://www.mouser.com/ds/2/447/UPY-GPHC_X5R_4V-to-50V_25-1131599.pdf?src-supplier=Mouser, ComponentLink2Description=http://www.yageo.com/documents/recent/UPY-GPHC_X5R_4V-to-50V-16.pdf?src-supplier=Future+Electronics, ComponentLink2URL=http://www.yageo.com/documents/recent/UPY-GPHC_X5R_4V-to-50V-16.pdf?src-supplier=Future+Electronics, ComponentLink3Description=http://www.yageo.com/documents/recent/UPY-GPHC_X5R_4V-to-50V_25.pdf?src-supplier=Digi-Key, ComponentLink3URL=http://www.yageo.com/documents/recent/UPY-GPHC_X5R_4V-to-50V_25.pdf?src-supplier=Digi-Key, Depth=0.5mm, Halogen Free="Halogen Free", Item Type=Capacitor, Lead Free="Lead Free", Length=0.039inch, Manufacturer Part Number=CC0402KRX5R8BB104, Mount="Surface Mount", Packaging="Tape and Reel", Pricing 1="1=0.10000, 10=0.03800, 50=0.02100, 100=0.01710, 500=0.01224, 1000=0.00961, 2500=0.00874, 5000=0.00804 (USD)", RoHS=Yes, RoHS Compliant=Yes, Series=CC, Stock 1=4598218, Supplier 1=Digi-Key, Thickness=0.022inch, Voltage Rating (DC)=25V, Width=0.02inch
C10: library part CA45-D025K476T, "47uF 25V 0.9Ω@100kHz ±10% CASE-D-7343 Tantalum Capacitors ROHS", LCSC Part Number=C123267, MAnufacturer="Hunan Xiangyee in S&T", Package=CASE-D-7343, ComponentLink1Description=LCSC, ComponentLink1URL=https://www.lcsc.com/product-detail/Tantalum-Capacitors_Hunan-Xiangyee-in-S-T-CA45-D025K476T_C123267.html, Item Type=Capacitor, Manufacturer Part Number=CA45-D025K476T
C11 C14 C18 C22 C23: library part CC0402KRX7R9BB103, "CAP CER 10000PF 50V X7R 0402", Case Code (Imperial)=0402, Case Code (Metric)=1005, Dielectric=X7R, LCSC Part Number=C60133, MAnufacturer=Yageo, Max Operating Temperature=125°C, Min Operating Temperature=-55°C, Package Quantity=1, Resistor Type=Ceramic, Tolerance=10%, Voltage=50V, Capacitance=10nF, Case/Package=0402, Category="Ceramic Capacitors", ComponentLink1Description=https://datasheet.ciiva.com/11788/0900766b8079c870-11788375.pdf?src-supplier=RSComponents, ComponentLink1URL=https://datasheet.ciiva.com/11788/0900766b8079c870-11788375.pdf?src-supplier=RSComponents, ComponentLink2Description=https://datasheet.ciiva.com/26862/getdatasheetpartid-138248-26862642.pdf?src-supplier=Verical, ComponentLink2URL=https://datasheet.ciiva.com/26862/getdatasheetpartid-138248-26862642.pdf?src-supplier=Verical, ComponentLink3Description=https://datasheet.ciiva.com/7978/1489800-7978093.pdf?src-supplier=Element14, ComponentLink3URL=https://datasheet.ciiva.com/7978/1489800-7978093.pdf?src-supplier=Element14, ComponentLink4Description=https://datasheet.ciiva.com/28450/1489800-28450377.pdf?src-supplier=Element14, ComponentLink4URL=https://datasheet.ciiva.com/28450/1489800-28450377.pdf?src-supplier=Element14, ComponentLink5Description=https://datasheet.ciiva.com/176/mlccorderingcode-176349.pdf?src-supplier=Digi-Key, ComponentLink5URL=https://datasheet.ciiva.com/176/mlccorderingcode-176349.pdf?src-supplier=Digi-Key, ComponentLink6Description=https://datasheet.ciiva.com/176/mlccorderingcode-176348.pdf?src-supplier=Digi-Key, ComponentLink6URL=https://datasheet.ciiva.com/176/mlccorderingcode-176348.pdf?src-supplier=Digi-Key, ComponentLink7Description=https://datasheet.ciiva.com/176/mlccorderingcode-176350.pdf?src-supplier=Digi-Key, ComponentLink7URL=https://datasheet.ciiva.com/176/mlccorderingcode-176350.pdf?src-supplier=Digi-Key, Depth=0.5mm, Halogen Free="Halogen Free", Height=0.5mm, Item Type=Capacitor, Lead Free="Lead Free", Length=1mm, Manufacturer Part Number=CC0402KRX7R9BB103, Mount="Surface Mount", Packaging="Tape and Reel", Pricing 1="10000=0.00178 (USD)", Radiation Hardening=No, Reach SVHC Compliant=Yes, RoHS=Yes, RoHS Compliant=Yes, Series=CC, Stock 1=995000, Supplier 1=Avnet, Supplier Part Number 1=CC0402KRX7R9BB103, Termination=SMD/SMT, Thickness=0.022inch, Voltage Rating=50V, Voltage Rating (DC)=50V, Width=0.02inch
C13 C16 C20: library part GRM155R61E225KE11D, "CAP CER 2.2UF 25V X5R 0402", Capacitance=2.2uF, Case Code (Imperial)=0402, Case Code (Metric)=1005, Dielectric=X5R, LCSC Part Number=C385032, MAnufacturer=Murata, Max Operating Temperature=85°C, Min Operating Temperature=-55°C, Package Quantity=10000, Resistor Type=Ceramic, Tolerance=10%, Voltage Rating=25V, Case/Package=0402, Category="Ceramic Capacitors", ComponentLink1Description=http://www.mouser.com/ds/2/281/c02e-2905.pdf?src-supplier=Mouser, ComponentLink1URL=http://www.mouser.com/ds/2/281/c02e-2905.pdf?src-supplier=Mouser, ComponentLink2Description=http://search.murata.co.jp/Ceramy/image/img/A01X/G101/ENG/GRM155R61E225KE11-01.pdf?src-supplier=Digi-Key, ComponentLink2URL=http://search.murata.co.jp/Ceramy/image/img/A01X/G101/ENG/GRM155R61E225KE11-01.pdf?src-supplier=Digi-Key, ComponentLink3Description=http://search.murata.co.jp/Ceramy/image/img/A01X/partnumbering_e_01.pdf?src-supplier=Digi-Key, ComponentLink3URL=http://search.murata.co.jp/Ceramy/image/img/A01X/partnumbering_e_01.pdf?src-supplier=Digi-Key, ComponentLink4Description=http://psearch.en.murata.com/capacitor/product/GRM155R61E225KE11%23.pdf?src-supplier=Avnet, ComponentLink4URL=http://psearch.en.murata.com/capacitor/product/GRM155R61E225KE11%23.pdf?src-supplier=Avnet, Height=0.5mm, Item Type=Capacitor, Lead Free="Lead Free", Length=1mm, Manufacturer Part Number=GRM155R61E225KE11D, Material=Ceramic, Mount="Surface Mount", Packaging="Tape and Reel", Pricing 1="10000=0.03830, 20000=0.03623, 40000=0.03416, 60000=0.03209, 80000=0.03002, 100000=0.02795, 1000000=0.02588 (USD)", RoHS=Yes, RoHS Compliant=Yes, Stock 1=210000, Supplier 1=Avnet, Supplier Part Number 1=GRM155R61E225KE11D, Termination=SMD/SMT, Thickness=0.022inch, Voltage Rating (DC)=25V, Weight=0.000212oz, Width=0.5mm
C17: library part CC1206KKX7RCBB472, "CAP CER 4700PF 1KV X7R 1206", Case Code (Imperial)=1206, Case Code (Metric)=3216, Dielectric=X7R, Dielectric Material=Ceramic, LCSC Part Number=C107198, MAnufacturer=Yageo, Max Operating Temperature=125°C, Min Operating Temperature=-55°C, Supplier Part Number 1=7130131, Tolerance=10%, Voltage Rating=1kV, Capacitance=4.7nF, Case/Package=1206, Category="Ceramic Capacitors", ComponentLink1Description=https://datasheet.ciiva.com/13208/upy-gp-np0-16v-to-50v-8-13208693.pdf?src-supplier=Mouser, ComponentLink1URL=https://datasheet.ciiva.com/13208/upy-gp-np0-16v-to-50v-8-13208693.pdf?src-supplier=Mouser, ComponentLink2Description=https://datasheet.ciiva.com/11466/hv-11466701.pdf?src-supplier=Avnet, ComponentLink2URL=https://datasheet.ciiva.com/11466/hv-11466701.pdf?src-supplier=Avnet, Depth=1.6mm, Item Type=Capacitor, Lead Free="Lead Free", Length=3.2mm, Manufacturer Part Number=CC1206KKX7RCBB472, Mount="Surface Mount", Number of Pins=2, Packaging="Tape and Reel", Pricing 1="3000=0.02860, 9000=0.02750, 15000=0.02700, 45000=0.02600, 75000=0.02510 (USD)", Radiation Hardening=No, Resistor Type=Ceramic, RoHS=Yes, RoHS Compliant=Yes, Series=CC, Stock 1=180000, Supplier 1="Future Electronics", Termination=SMD/SMT, Thickness=0.057inch, Voltage Rating (DC)=1kV, Weight=0.000571oz, Width=0.063inch
C21 C30: library part CC0402JRNPO9BN200, "CAP CER 20PF 50V C0G/NPO 0402", LCSC Part Number=C107000, MAnufacturer=Yageo, Temperature Coefficient=30ppm/°C, ComponentLink1Description=https://datasheet.ciiva.com/176/mlccorderingcode-176360.pdf?src-supplier=Digikey, ComponentLink1URL=https://datasheet.ciiva.com/176/mlccorderingcode-176360.pdf?src-supplier=Digikey, ComponentLink2Description=https://datasheet.ciiva.com/176/mlccorderingcode-176361.pdf?src-supplier=Digikey, ComponentLink2URL=https://datasheet.ciiva.com/176/mlccorderingcode-176361.pdf?src-supplier=Digikey, ComponentLink3Description=https://datasheet.ciiva.com/176/mlccorderingcode-176362.pdf?src-supplier=Digikey, ComponentLink3URL=https://datasheet.ciiva.com/176/mlccorderingcode-176362.pdf?src-supplier=Digikey, ComponentLink4Description=https://datasheet.ciiva.com/7656/1132289-7656614.pdf?src-supplier=Element14, ComponentLink4URL=https://datasheet.ciiva.com/7656/1132289-7656614.pdf?src-supplier=Element14, ComponentLink5Description=https://datasheet.ciiva.com/5427/upy-gp-np0-16v-to-50v-8-3714-5427769.pdf?src-supplier=Mouser, ComponentLink5URL=https://datasheet.ciiva.com/5427/upy-gp-np0-16v-to-50v-8-3714-5427769.pdf?src-supplier=Mouser, Halogen Free=5694HalogenFree, Item Type=Capacitor, Manufacturer Part Number=CC0402JRNPO9BN200, Pricing="10000=0.00221 (USD)", RoHS=Yes, Stock=20000, Supplier=Avnet
C26 C28: library part CC0402KRX5R6BB475, "CAP CER 4.7UF 10V X5R 0402", Case Code (Imperial)=0402, Case Code (Metric)=1005, LCSC Part Number=C326586, MAnufacturer=Yageo, Max Operating Temperature=85°C, Min Operating Temperature=-55°C, Supplier Part Number 1=3871698, Tolerance=10%, Voltage Rating=10V, Capacitance=4.7uF, Case/Package=0402, Category="Ceramic Capacitors", ComponentLink1Description=http://www.yageo.com/documents/recent/UPY-GPHC_X5R_4V-to-50V_25.pdf?src-supplier=Digi-Key, ComponentLink1URL=http://www.yageo.com/documents/recent/UPY-GPHC_X5R_4V-to-50V_25.pdf?src-supplier=Digi-Key, Manufacturer Part Number=CC0402KRX5R6BB475, Mount="Surface Mount", Packaging="Cut Tape", Pricing 1="10000=0.02310, 50000=0.02100 (GBP)", RoHS=Yes, RoHS Compliant=Yes, Stock 1=20000, Supplier 1=Farnell
C31 C32 C33: library part TAJE107M025RNJ, "CAP TANT 100UF 20% 25V 2917", Case Code (Imperial)=2917, Case Code (Metric)=7343, ESR (Equivalent Series Resistance)=300mR, LCSC Part Number=C7230, Leakage Current=25uA, MAnufacturer="Kyocera AVX", Max Operating Temperature=125°C, Min Operating Temperature=-55°C, Package Quantity=1, Supplier Part Number 1=581-TAJE107M025RNJ, Tolerance=20%, Voltage Rating=25V, Capacitance=100uF, Case/Package=2917, Category="Tantalum Capacitors", ComponentLink1Description=https://datasheet.ciiva.com/26787/taje107m025rnj-26787048.pdf?src-supplier=IIIC, ComponentLink1URL=https://datasheet.ciiva.com/26787/taje107m025rnj-26787048.pdf?src-supplier=IIIC, ComponentLink2Description=https://datasheet.ciiva.com/265/taj-265541.pdf?src-supplier=Digi-Key, ComponentLink2URL=https://datasheet.ciiva.com/265/taj-265541.pdf?src-supplier=Digi-Key, ComponentLink3Description=https://datasheet.ciiva.com/265/taj-265542.pdf?src-supplier=Digi-Key, ComponentLink3URL=https://datasheet.ciiva.com/265/taj-265542.pdf?src-supplier=Digi-Key, ComponentLink4Description=https://datasheet.ciiva.com/265/taj-265540.pdf?src-supplier=Digi-Key, ComponentLink4URL=https://datasheet.ciiva.com/265/taj-265540.pdf?src-supplier=Digi-Key, ComponentLink5Description=https://datasheet.ciiva.com/28609/1719052-28609254.pdf?src-supplier=Element14, ComponentLink5URL=https://datasheet.ciiva.com/28609/1719052-28609254.pdf?src-supplier=Element14, ComponentLink6Description=https://datasheet.ciiva.com/11230/taj-11230456.pdf?src-supplier=Avnet, ComponentLink6URL=https://datasheet.ciiva.com/11230/taj-11230456.pdf?src-supplier=Avnet, ComponentLink7Description=https://datasheet.ciiva.com/17339/taj-17339677.pdf?src-supplier=Avnet+Europe, ComponentLink7URL=https://datasheet.ciiva.com/17339/taj-17339677.pdf?src-supplier=Avnet+Europe, ComponentLink8Description=https://datasheet.ciiva.com/22667/1719052-22667581.pdf?src-supplier=Element14, ComponentLink8URL=https://datasheet.ciiva.com/22667/1719052-22667581.pdf?src-supplier=Element14, Construction=Flat, Depth=4.3mm, Dissipation Factor=10%, Features="General Purpose", Height=4.3mm, Height - Seated (Max)=0.169inch, Lead Free="Lead Free", Length=7.3mm, Manufacturer Part Number=TAJE107M025RNJ, Mount="Surface Mount", Number of Pins=2, Packaging="Tape and Reel", Polarity=Polar, Pricing 1="1=2.81000, 10=2.81000, 50=2.81000, 100=2.19000, 1000=1.76000, 10000=1.76000 (USD)", Radiation Hardening=No, REACH SVHC="No SVHC", RoHS=Yes, RoHS Compliant=Yes, Series=TAJ, Stock 1=109, Supplier 1=Mouser, Termination=SMD/SMT, Voltage Rating (DC)=25V, Width=4.3mm
C34 C35 C36 C40: library part CL10A226MO7JZNC, "CAP CER 22UF 16V X5R 0603", Case Code (Imperial)=0603, Case Code (Metric)=1608, LCSC Part Number=C2762594, MAnufacturer=Samsung, Max Operating Temperature=85°C, Min Operating Temperature=-55°C, Tolerance=20%, Voltage Rating=16V, Case/Package=0603, ComponentLink1Description=http://www.samsungsem.com/kr/support/product-search/mlcc/CL10A226MO7JZNC.jsp?src-supplier=Digikey, ComponentLink1URL=http://www.samsungsem.com/kr/support/product-search/mlcc/CL10A226MO7JZNC.jsp?src-supplier=Digikey, ComponentLink2Description=https://datasheet.octopart.com/CL10A226MO7JZNC-Samsung-Electro-Mechanics-datasheet-149156497.pdf?src-supplier=Future+Electronics, ComponentLink2URL=https://datasheet.octopart.com/CL10A226MO7JZNC-Samsung-Electro-Mechanics-datasheet-149156497.pdf?src-supplier=Future+Electronics, Height=900um, Item Type=Capacitors, Manufacturer Part Number=CL10A226MO7JZNC, Material=4241ConductorMaterial, Mounting Technology="Surface Mount", Packaging="Cut Tape", Pricing="1=0.65, 10=0.391, 50=0.2884, 100=0.2564, 500=0.20198, 1000=0.18499 (USD)", RoHS=Yes, RoHS Compliant=Yes, Series=CL, Stock=944984, Supplier=Digikey
C39: library part T491X227K016AT, "CAP TANT 220UF 10% 16V 2917", LCSC Part Number=C122311, MAnufacturer=KEMET, ComponentLink1Description=LCSC, ComponentLink1URL=https://www.lcsc.com/product-detail/Tantalum-Capacitors_KEMET-T491X227K016AT_C122311.html, Item Type=Capacitor, Manufacturer Part Number=T491X227K016AT
C41: library part GRM188C71C475KE21D, "CAP CER 4.7UF 16V X7S 0603", Case/Package=0603, Dielectric=1542DielectricType, LCSC Part Number=C237615, MAnufacturer=Murata, Max Operating Temperature=125°C, Min Operating Temperature=-55°C, Tolerance=10%, Voltage Rating=16V, ComponentLink1Description=http://search.murata.co.jp/Ceramy/image/img/A01X/G101/ENG/GRM188C71C475KE21-01.pdf?src-supplier=Digikey, ComponentLink1URL=http://search.murata.co.jp/Ceramy/image/img/A01X/G101/ENG/GRM188C71C475KE21-01.pdf?src-supplier=Digikey, Height=950um, Item Type=Capacitors, Length=1.6mm, Manufacturer Part Number=GRM188C71C475KE21D, Material=4241ConductorMaterial, Mounting Technology="Surface Mount", Pricing="1=0.27, 10=0.113, 50=0.113, 100=0.075, 1000=0.067, 10000=0.046 (USD)", RoHS=Yes, RoHS Compliant=Yes, Series=GRM, Stock=23513, Supplier=Mouser, Thickness=800um, Voltage Rating (DC)=16V, Width=800um
C42: library part CC0603KRX7R0BB472, "CAP CER 4700PF 100V X7R 0603", Dielectric Material=4241ConductorMaterial, LCSC Part Number=C115052, MAnufacturer=Yageo, Voltage Rating (AC)=100V, ComponentLink1Description=https://datasheet.ciiva.com/8033/1669968-8033781.pdf?src-supplier=Element14, ComponentLink1URL=https://datasheet.ciiva.com/8033/1669968-8033781.pdf?src-supplier=Element14, Item Type=Capacitor, Lead Free=5697LeadFree, Manufacturer Part Number=CC0603KRX7R0BB472, Pricing="1=0.1, 10=0.05, 50=0.0288, 100=0.0223, 500=0.0168, 1000=0.01319 (USD)", RoHS=Yes, Stock=67499, Supplier=Digikey
C43: library part CC0603JRNPO9BN150, "CAP CER 15PF 50V C0G/NPO 0603", Case Code (Imperial)=0603, Case Code (Metric)=1608, Dielectric=C0G, Dielectric Material=Ceramic, Insulation Resistance=100GR, LCSC Part Number=C107037, MAnufacturer=Yageo, Max Operating Temperature=125°C, Min Operating Temperature=-55°C, Package Quantity=1, Supplier Part Number 1=4234670, Tolerance=5%, Voltage Rating=50V, Case/Package=0603, Category="Ceramic Capacitors", ComponentLink1Description=https://datasheet.ciiva.com/144/mlccorderingcode-144635.pdf?src-supplier=Digi-Key, ComponentLink1URL=https://datasheet.ciiva.com/144/mlccorderingcode-144635.pdf?src-supplier=Digi-Key, ComponentLink2Description=https://datasheet.ciiva.com/144/mlccorderingcode-144636.pdf?src-supplier=Digi-Key, ComponentLink2URL=https://datasheet.ciiva.com/144/mlccorderingcode-144636.pdf?src-supplier=Digi-Key, ComponentLink3Description=https://datasheet.ciiva.com/8033/1443161-8033721.pdf?src-supplier=Element14, ComponentLink3URL=https://datasheet.ciiva.com/8033/1443161-8033721.pdf?src-supplier=Element14, ComponentLink4Description=https://datasheet.ciiva.com/28450/1443161-28450472.pdf?src-supplier=Element14, ComponentLink4URL=https://datasheet.ciiva.com/28450/1443161-28450472.pdf?src-supplier=Element14, ComponentLink5Description=https://datasheet.ciiva.com/144/mlccorderingcode-144634.pdf?src-supplier=Digi-Key, ComponentLink5URL=https://datasheet.ciiva.com/144/mlccorderingcode-144634.pdf?src-supplier=Digi-Key, ComponentLink6Description=https://datasheet.ciiva.com/8033/1734582-8033723.pdf?src-supplier=Element14, ComponentLink6URL=https://datasheet.ciiva.com/8033/1734582-8033723.pdf?src-supplier=Element14, ComponentLink7Description=https://datasheet.ciiva.com/8033/1734582-8033722.pdf?src-supplier=Element14, ComponentLink7URL=https://datasheet.ciiva.com/8033/1734582-8033722.pdf?src-supplier=Element14, ComponentLink8Description=https://datasheet.ciiva.com/11464/upy-gp-np0-16v-to-50v-8-11464727.pdf?src-supplier=Avnet, ComponentLink8URL=https://datasheet.ciiva.com/11464/upy-gp-np0-16v-to-50v-8-11464727.pdf?src-supplier=Avnet, Depth=0.8mm, Height=0.8mm, Item Type=Capacitor, Lead Free="Lead Free", Length=1.6mm, Manufacturer Part Number=CC0603JRNPO9BN150, Mounting Technology="Surface Mount", Packaging="Tape and Reel", Pins=2, Pricing 1="4000=0.0038, 16000=0.0036, 80000=0.0034, 160000=0.0033, 500000=0.0031 (USD)", Radiation Hardening=No, Reach SVHC Compliant=No, RoHS=Yes, RoHS Compliant=Yes, Series=CC, Stock 1=832000, Supplier 1="Future Electronics", Termination=SMD/SMT, Thickness=0.035inch, Width=0.031inch
D1: "TVS DIODE 5VWM 6.3VC DSN0603-2", LCSC Part Number=C477989, MAnufacturer=Nexperia, Category="ESD and Circuit Protection ICs", ComponentLink1Description=http://www.farnell.com/datasheets/1961312.pdf?src-supplier=Farnell, ComponentLink1URL=http://www.farnell.com/datasheets/1961312.pdf?src-supplier=Farnell, ComponentLink2Description=https://assets.nexperia.com/documents/data-sheet/PESD5V0H1BSF.pdf?src-supplier=Digi-Key, ComponentLink2URL=https://assets.nexperia.com/documents/data-sheet/PESD5V0H1BSF.pdf?src-supplier=Digi-Key, ComponentLink3Description=http://www.farnell.com/datasheets/1961312.pdf?src-supplier=Newark, ComponentLink3URL=http://www.farnell.com/datasheets/1961312.pdf?src-supplier=Newark, Item Type=Diode, Manufacturer Part Number=PESD5V0H1BSFYL, Pricing 1="18000=0.06453, 36000=0.06278, 54000=0.06104, 90000=0.05930, 180000=0.05755, 900000=0.05581, 1800000=0.05406 (USD)", RoHS=Yes, RoHS Compliant=Yes, Stock 1=9000, Supplier 1=Avnet, Supplier Part Number 1=PESD5V0H1BSFYL
D2 D3: "DIODE SCHOTTKY 5A 40V SMB", LCSC Part Number=C3759253, MAnufacturer=Comchip, Supplier Part Number 1=750-SS54B-HF, Manufacturer Part Number=SS54B-HF, Pricing 1="1=0.56000, 10=0.32900, 50=0.32900, 100=0.17100, 1000=0.11900, 10000=0.09000 (USD)", RoHS=No, Stock 1=2862, Supplier 1=Mouser
D4: "16A 20V 7V 5V@Max Unidirectional SOT-23 TVS ROHS", LCSC Part Number=C239643, MAnufacturer=WILLSEMI, Package=SOT-23, ComponentLink1Description=LCSC, ComponentLink1URL=https://www.lcsc.com/product-detail/TVS_WILLSEMI-Will-Semicon-ESD5302F-3-TR_C239643.html, Item Type=Diode, Manufacturer Part Number=ESD5302F-3/TR
J1: "3A Straight Square Pins 2.5mm 6P 6mm -40℃~+105℃ 3mm 2.54mm 双排 Black 2x3P 2.54mm Plugin,P=2.54mm Pin Headers ROHS", LCSC Part no=C2685197, MAnufacturer=Liansheng, ComponentLink1Description=LCSC, ComponentLink1URL=https://www.lcsc.com/product-detail/Pin-Headers_Liansheng-PH-01291_C2685197.html, Item Type="Male Header", Manufacturer Part Number=PH-01291
J3: "2mm pitch Solder Pad"
J4: "5A 1 16P Female Type-C SMD USB Connectors ROHS", LCSC Part Number=C165948, MAnufacturer="Korean Hroparts Elec", ComponentLink1Description=LCSC, ComponentLink1URL=https://www.lcsc.com/product-detail/USB-Connectors_Korean-Hroparts-Elec-TYPE-C-31-M-12_C165948.html, Item Type="USB Connector", Manufacturer Part Number=TYPE-C-31-M-12
J5 J6 J7 J8 J9 J10: "CONN FFC FPC BOTTOM 5POS 1MM R/A", MAnufacturer="Amphenol ICC / FCI", Supplier Part Number=62K5638, ComponentLink1Description=https://datasheet.ciiva.com/5137/sfw12lf-5137830.pdf?src-supplier=Mouser, ComponentLink1URL=https://datasheet.ciiva.com/5137/sfw12lf-5137830.pdf?src-supplier=Mouser, ComponentLink2Description=https://datasheet.ciiva.com/8038/sfw12lf-8038169.pdf?src-supplier=Element14, ComponentLink2URL=https://datasheet.ciiva.com/8038/sfw12lf-8038169.pdf?src-supplier=Element14, ComponentLink3Description=https://datasheet.ciiva.com/10369/sfw12lf-10369098.pdf?src-supplier=Avnet, ComponentLink3URL=https://datasheet.ciiva.com/10369/sfw12lf-10369098.pdf?src-supplier=Avnet, ComponentLink4Description=https://datasheet.ciiva.com/670/sfw12lf-670021.pdf?src-supplier=Digikey, ComponentLink4URL=https://datasheet.ciiva.com/670/sfw12lf-670021.pdf?src-supplier=Digikey, ComponentLink5Description=https://datasheet.ciiva.com/670/sfw12lf-670022.pdf?src-supplier=Digikey, ComponentLink5URL=https://datasheet.ciiva.com/670/sfw12lf-670022.pdf?src-supplier=Digikey, ComponentLink6Description=https://datasheet.ciiva.com/670/sfw12lf-670023.pdf?src-supplier=Digikey, ComponentLink6URL=https://datasheet.ciiva.com/670/sfw12lf-670023.pdf?src-supplier=Digikey, Item Type="FFC / FPC", Manufacturer Part Number=SFW5R-1STE1LF, Pricing="1=0.257 (USD)", RoHS=Yes, Stock=33, Supplier=Avnet
L1: library part YSPIT0770A-1R8M, "21A 1.8uH Integrated molded inductor ±20% 25A SMD,7.8x7.6mm Power Inductors ROHS", MAnufacturer=YJYCOIN, ComponentLink1Description=LCSC, ComponentLink1URL=http://lcsc.com/product-detail/Power-Inductors_YJYCOIN-YSPIT0770A-1R8M_C19630747.html, Item Type=Inductors, Manufacturer Part Number=YSPIT0770A-1R8M
LED1 LED2: library part NCD0603B3, "blue 0603 Light Emitting Diodes (LED) ROHS", LCSC Part Number=C158101, MAnufacturer="Foshan NationStar Optoelectronics", Package=0603, ComponentLink1Description=LCSC, ComponentLink1URL=https://www.lcsc.com/product-detail/Light-Emitting-Diodes-LED_Foshan-NationStar-Optoelectronics-NCD0603B3_C158101.html, Item Type=LED, Manufacturer Part Number=NCD0603B3
LED3 LED4: library part NCD0603Y2, "yellow 0603 Light Emitting Diodes (LED) ROHS", LCSC Part Number=C89811, MAnufacturer="Foshan NationStar Optoelectronics", Package=0603, ComponentLink1Description=LCSC, ComponentLink1URL=https://www.lcsc.com/product-detail/Light-Emitting-Diodes-LED_Foshan-NationStar-Optoelectronics-NCD0603Y2_C89811.html, Item Type=LED, Manufacturer Part Number=NCD0603Y2
Q1: "25-V, N channel NexFET™ power MOSFET, single SON 2 mm x 2 mm, 29 mOhm 6-WSON -55 to 150", MAnufacturer="Texas Instruments", Supplier Part Number=595-CSD16301Q2, Category=MOSFETs, ComponentLink1Description=https://datasheet.ciiva.com/22698/1536215-22698017.pdf?src-supplier=Element14, ComponentLink1URL=https://datasheet.ciiva.com/22698/1536215-22698017.pdf?src-supplier=Element14, ComponentLink2Description=https://datasheet.ciiva.com/4438/slps235c-122185-4438227.pdf?src-supplier=Mouser, ComponentLink2URL=https://datasheet.ciiva.com/4438/slps235c-122185-4438227.pdf?src-supplier=Mouser, ComponentLink3Description=https://datasheet.ciiva.com/6388/csd16301q2-6388192.pdf?src-supplier=Digikey, ComponentLink3URL=https://datasheet.ciiva.com/6388/csd16301q2-6388192.pdf?src-supplier=Digikey, ComponentLink4Description=https://datasheet.ciiva.com/14192/slps235c-14192869.pdf?src-supplier=Avnet, ComponentLink4URL=https://datasheet.ciiva.com/14192/slps235c-14192869.pdf?src-supplier=Avnet, ComponentLink5Description=https://datasheet.ciiva.com/7968/1536215-7968247.pdf?src-supplier=Element14, ComponentLink5URL=https://datasheet.ciiva.com/7968/1536215-7968247.pdf?src-supplier=Element14, ComponentLink6Description=https://datasheet.ciiva.com/6388/csd16301q2-6388189.pdf?src-supplier=Digikey, ComponentLink6URL=https://datasheet.ciiva.com/6388/csd16301q2-6388189.pdf?src-supplier=Digikey, Manufacturer Part Number=CSD16301Q2, Number of Channels=1NUMBER, Pricing="1=0.48, 10=0.312, 50=0.312, 100=0.298, 1000=0.196, 10000=0.145 (USD)", RoHS=Yes, Stock=34585, Supplier=Mouser, Thickness=750um
Q2: "MOSFET N-CH 12V 22A 6WSON", MAnufacturer="Texas Instruments", Supplier Part Number=595-CSD13202Q2, Category=MOSFETs, ComponentLink1Description=https://datasheet.ciiva.com/30021/csd13202q2-30021962.pdf?src-supplier=Avnet, ComponentLink1URL=https://datasheet.ciiva.com/30021/csd13202q2-30021962.pdf?src-supplier=Avnet, ComponentLink2Description=https://datasheet.ciiva.com/29747/csd13202q2-29747563.pdf?src-supplier=Digikey, ComponentLink2URL=https://datasheet.ciiva.com/29747/csd13202q2-29747563.pdf?src-supplier=Digikey, Manufacturer Part Number=CSD13202Q2, Pricing="1=0.53, 10=0.375, 50=0.375, 100=0.265, 1000=0.187, 10000=0.152 (USD)", RoHS=Yes, Stock=5521, Supplier=Mouser
R1 R5 R6 R7 R10 R11 R13 R15 R16 R17 R25: library part RC0402FR-0710KL, "RES 10K OHM 1% 1/16W 0402", Case Code (Imperial)=0402, Case Code (Metric)=1005, LCSC Part Number=C60490, MAnufacturer=Yageo, Max Operating Temperature=155°C, Max Power Dissipation=63mW, Min Operating Temperature=-55°C, Power Rating=62.5mW, Resistance=10kR, Resistance Tolerance=1%, Resistor Type="Thick Film", Supplier Part Number 1=603-RC0402FR-0710KL, Temperature Coefficient=100ppm/°C, Voltage Rating=50V, Case/Package=0402, Category="Chip SMD Resistors", ComponentLink1Description=https://datasheet.ciiva.com/7660/38568-7660787.pdf?src-supplier=Element14, ComponentLink1URL=https://datasheet.ciiva.com/7660/38568-7660787.pdf?src-supplier=Element14, ComponentLink2Description=https://datasheet.ciiva.com/7849/1686128-7849814.pdf?src-supplier=Element14, ComponentLink2URL=https://datasheet.ciiva.com/7849/1686128-7849814.pdf?src-supplier=Element14, ComponentLink3Description=https://datasheet.ciiva.com/7983/1018594-7983486.pdf?src-supplier=Element14, ComponentLink3URL=https://datasheet.ciiva.com/7983/1018594-7983486.pdf?src-supplier=Element14, ComponentLink4Description=https://datasheet.ciiva.com/22747/1018594-22747512.pdf?src-supplier=Element14, ComponentLink4URL=https://datasheet.ciiva.com/22747/1018594-22747512.pdf?src-supplier=Element14, ComponentLink5Description=https://datasheet.ciiva.com/12667/pyu-rc0402-51-rohs-l-6-r-12667067.pdf?src-supplier=Mouser, ComponentLink5URL=https://datasheet.ciiva.com/12667/pyu-rc0402-51-rohs-l-6-r-12667067.pdf?src-supplier=Mouser, ComponentLink6Description=https://datasheet.ciiva.com/7849/1784430-7849813.pdf?src-supplier=Element14, ComponentLink6URL=https://datasheet.ciiva.com/7849/1784430-7849813.pdf?src-supplier=Element14, ComponentLink7Description=https://datasheet.ciiva.com/7849/1784430-7849815.pdf?src-supplier=Element14, ComponentLink7URL=https://datasheet.ciiva.com/7849/1784430-7849815.pdf?src-supplier=Element14, Construction=Rectangular, Depth=0.5mm, Features="Moisture Resistant", Height=0.32mm, Item Type=Resistor, Lead Free="Lead Free", Lead Pitch=0.2mm, Length=1mm, Manufacturer Part Number=RC0402FR-0710KL, Military Standard=Not, Number of Pins=2, Number of Terminations=2, Packaging="Tape and Reel", Pricing 1="1=0.10000, 10=0.01400, 50=0.01400, 100=0.00500, 1000=0.00300, 10000=0.00200 (USD)", REACH SVHC="No SVHC", RoHS=Yes, RoHS Compliant=Yes, Series=RC, Stock 1=18648329, Supplier 1=Mouser, Termination=SMD/SMT, Tolerance=1%, Voltage Rating (DC)=50V, Width=0.5mm, Working Voltage=50V